# Altium PCB Grantv3.PcbDoc (part 1 of 5)
Units mil, origin at the board's own origin, x right, y up, seen from the top; angles counter-clockwise.
Board outline 3031.03 x 2829.03 mil, 2 copper layers (Top Layer, Bottom Layer); 187 components, 111 nets, 634 pads, 178 vias.
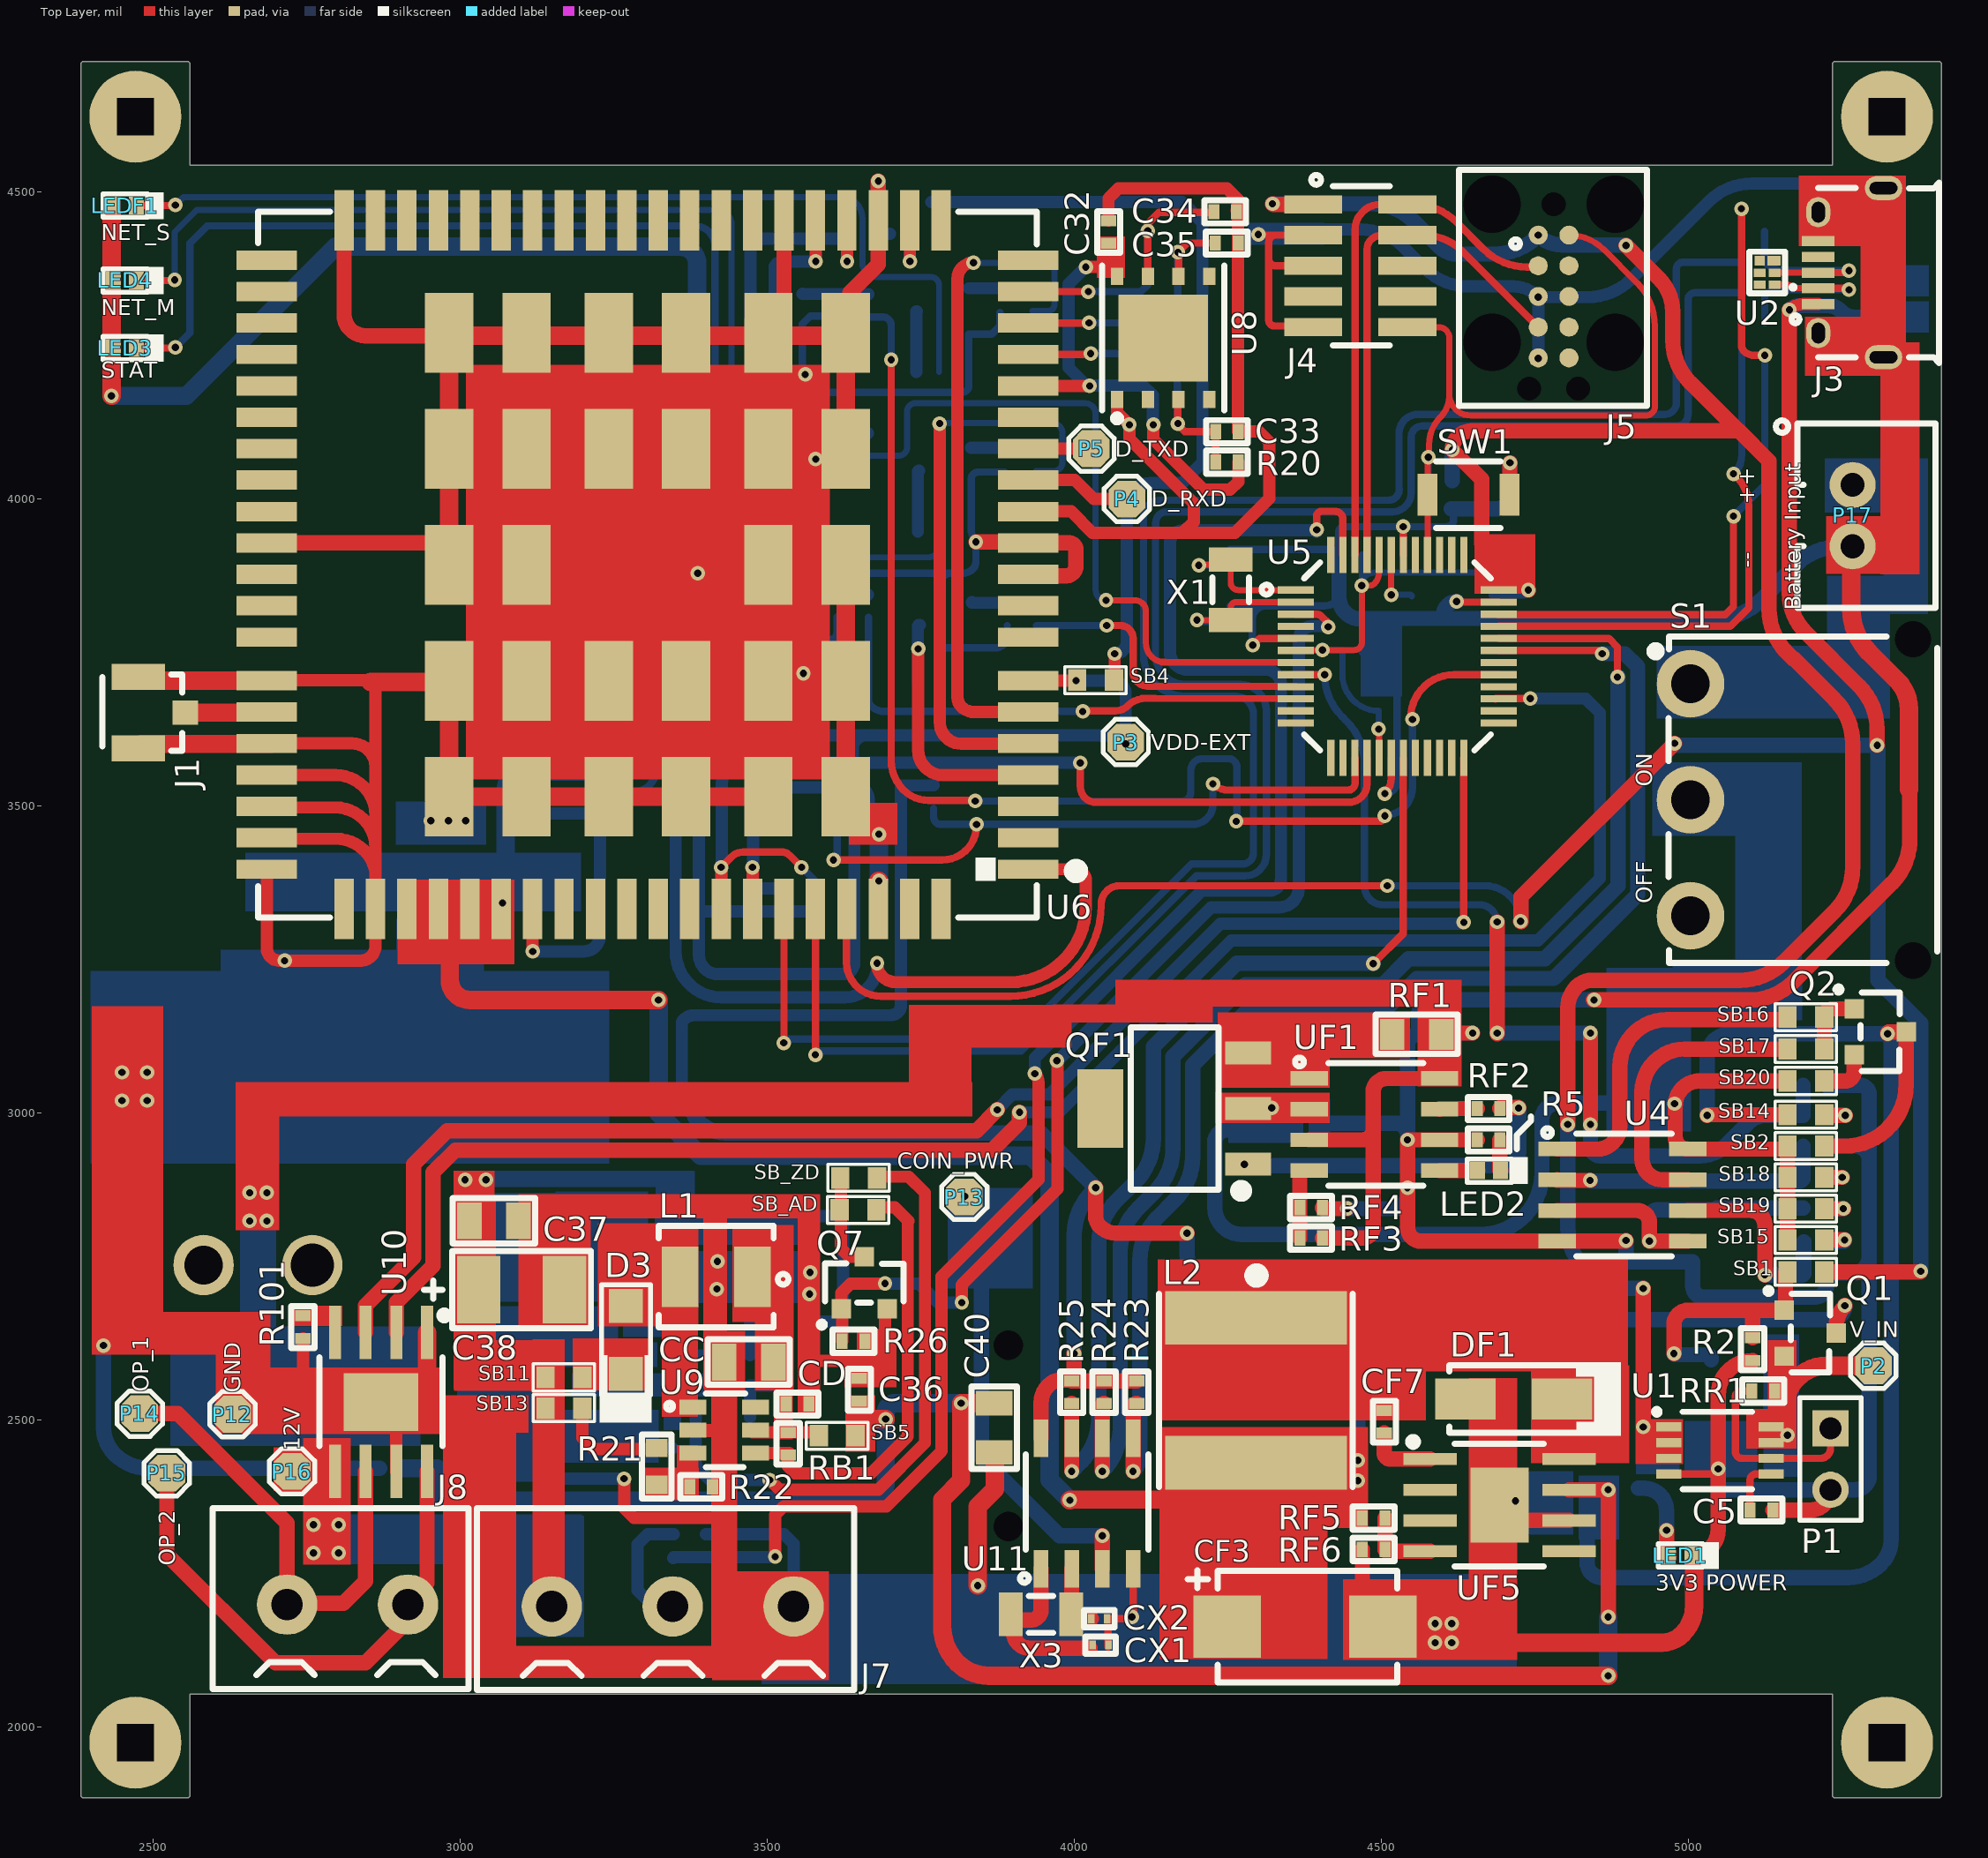
[diagram p0: Top Layer view]
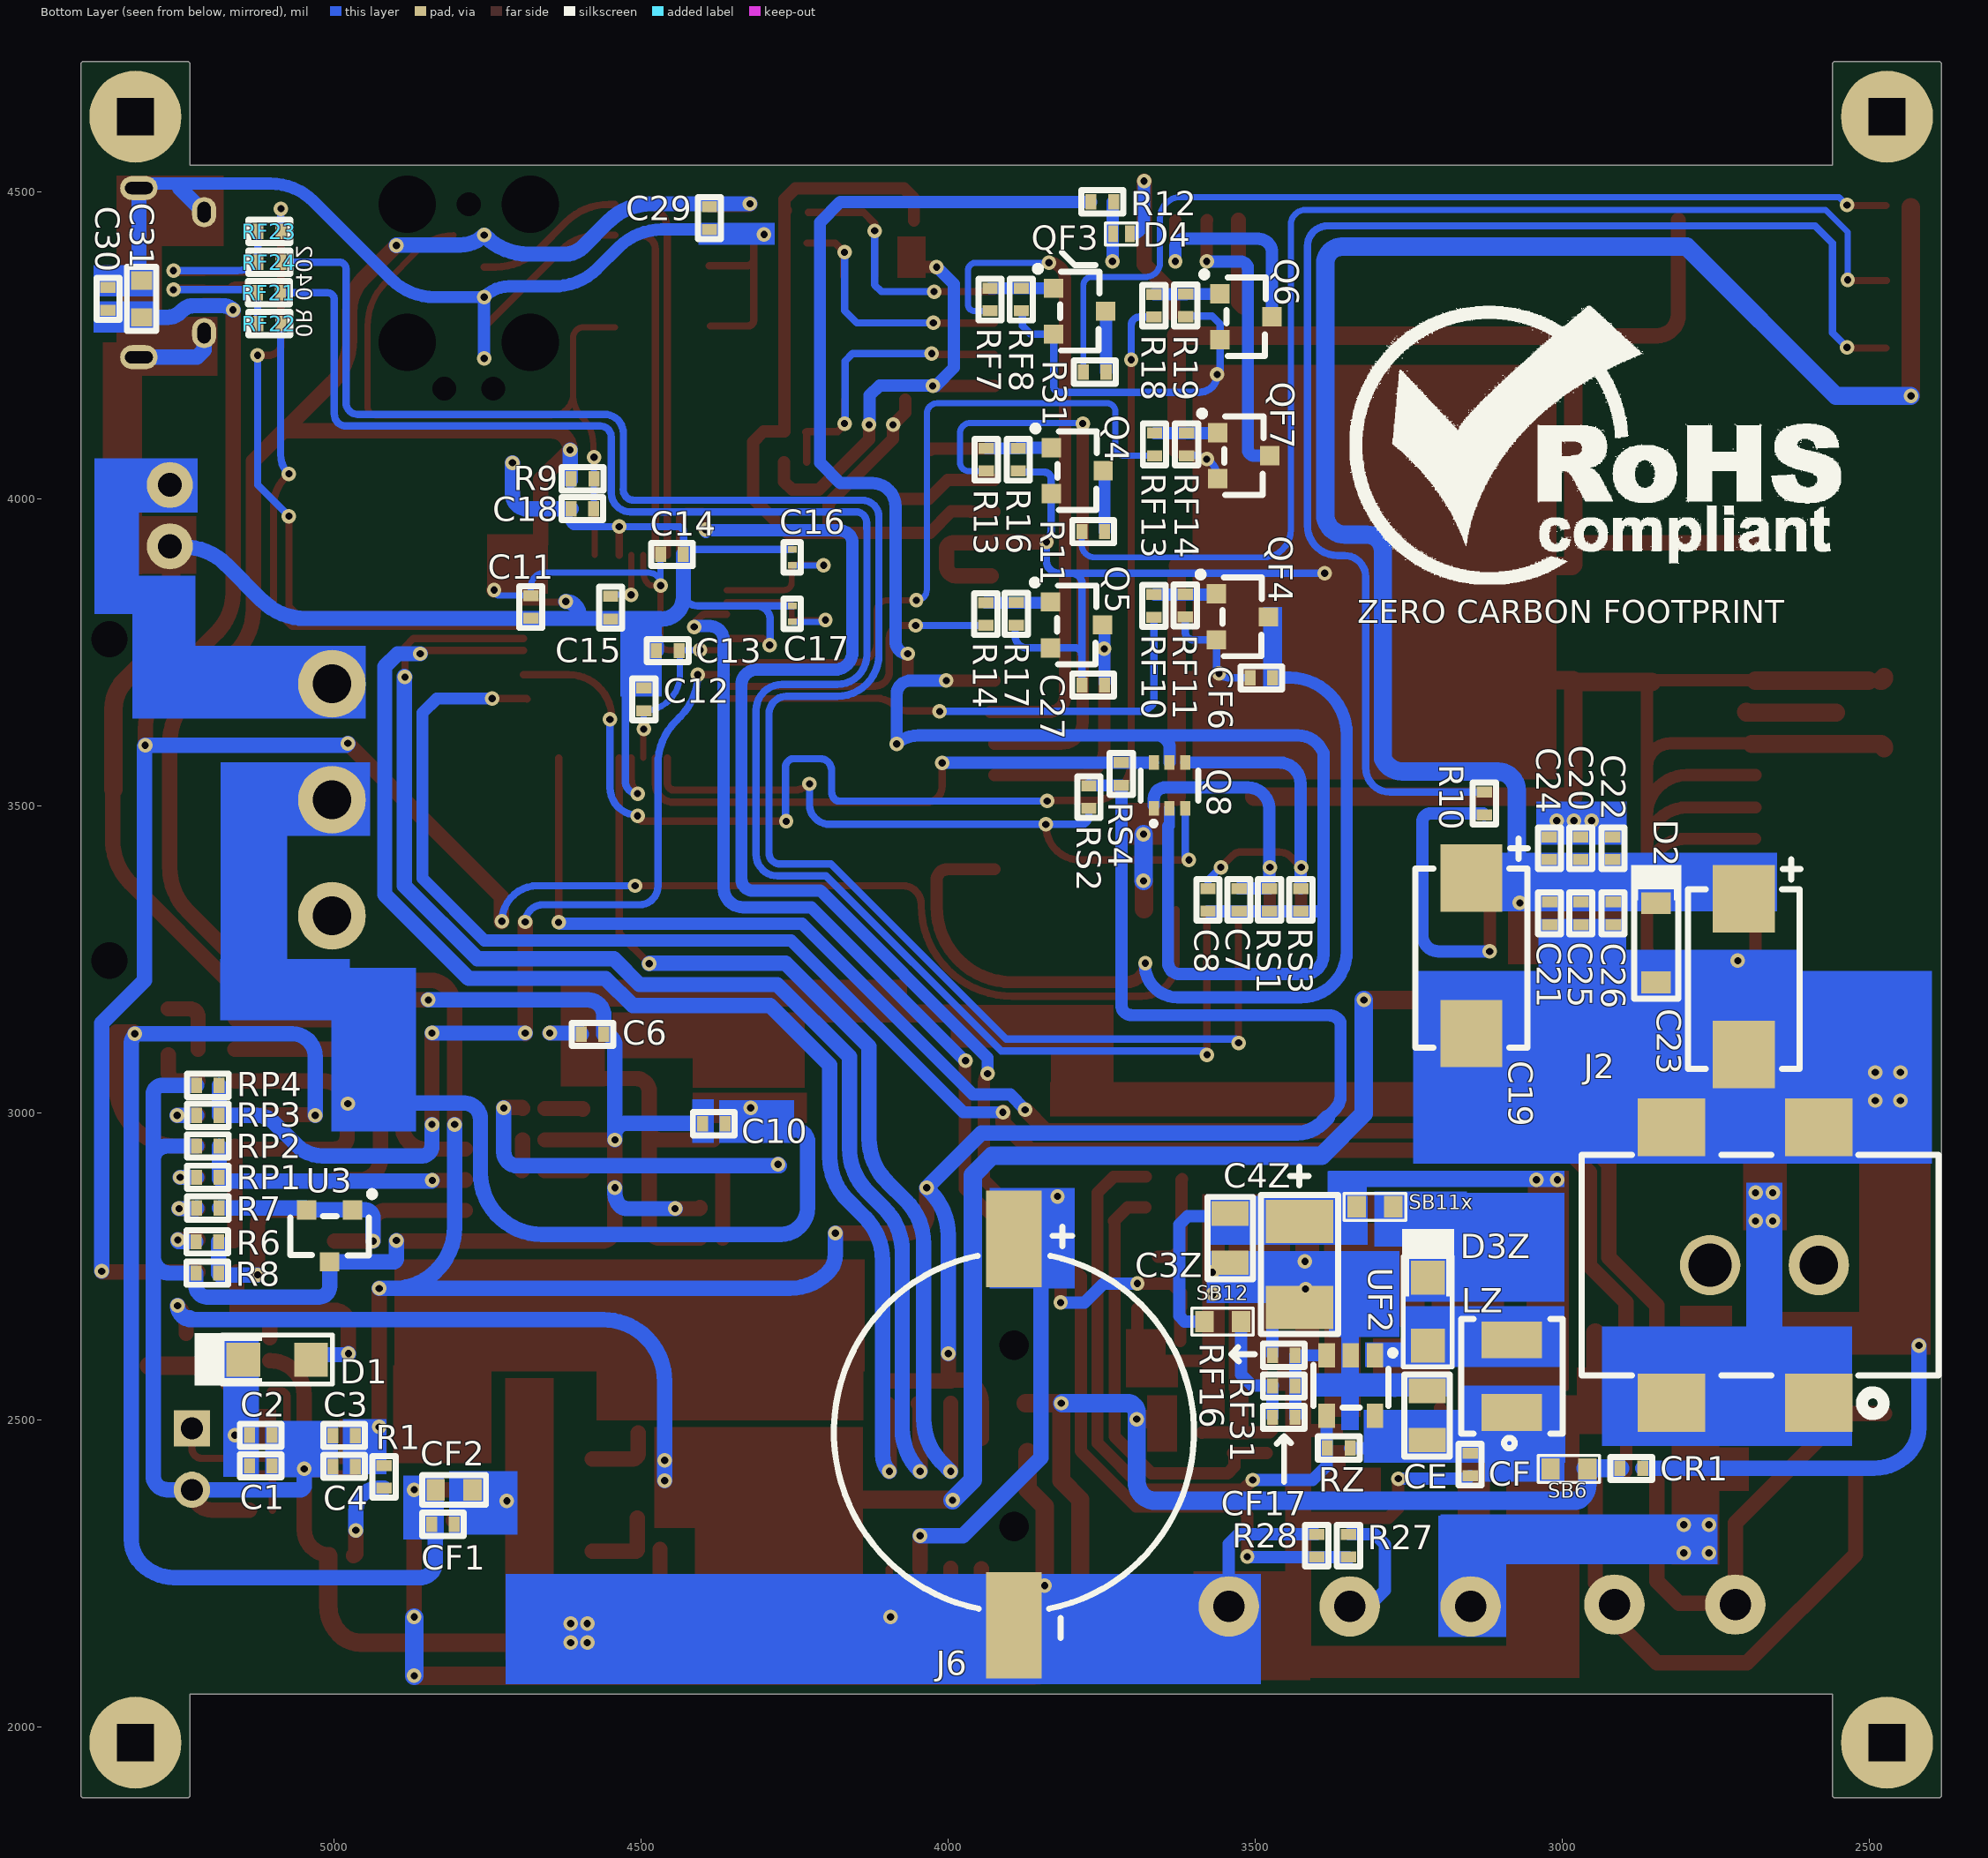
[diagram p1: Bottom Layer view, seen from below]
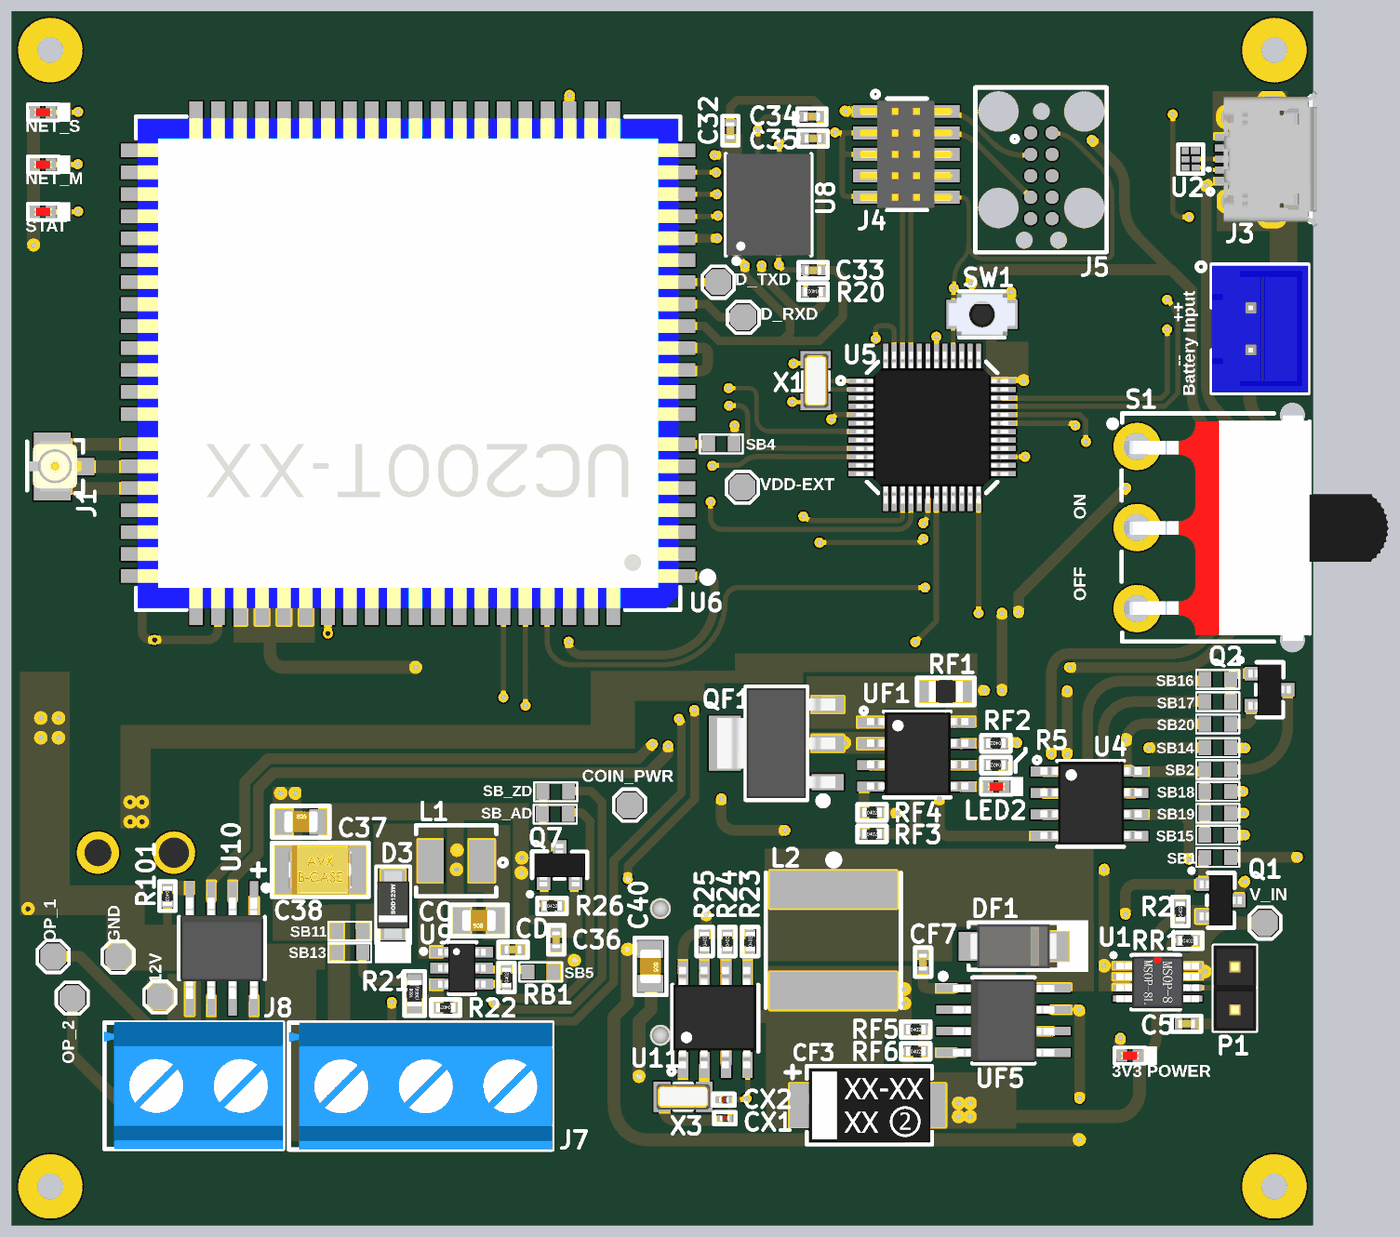
[diagram p4: 3D render of the assembled board from above, using the file's embedded part models]
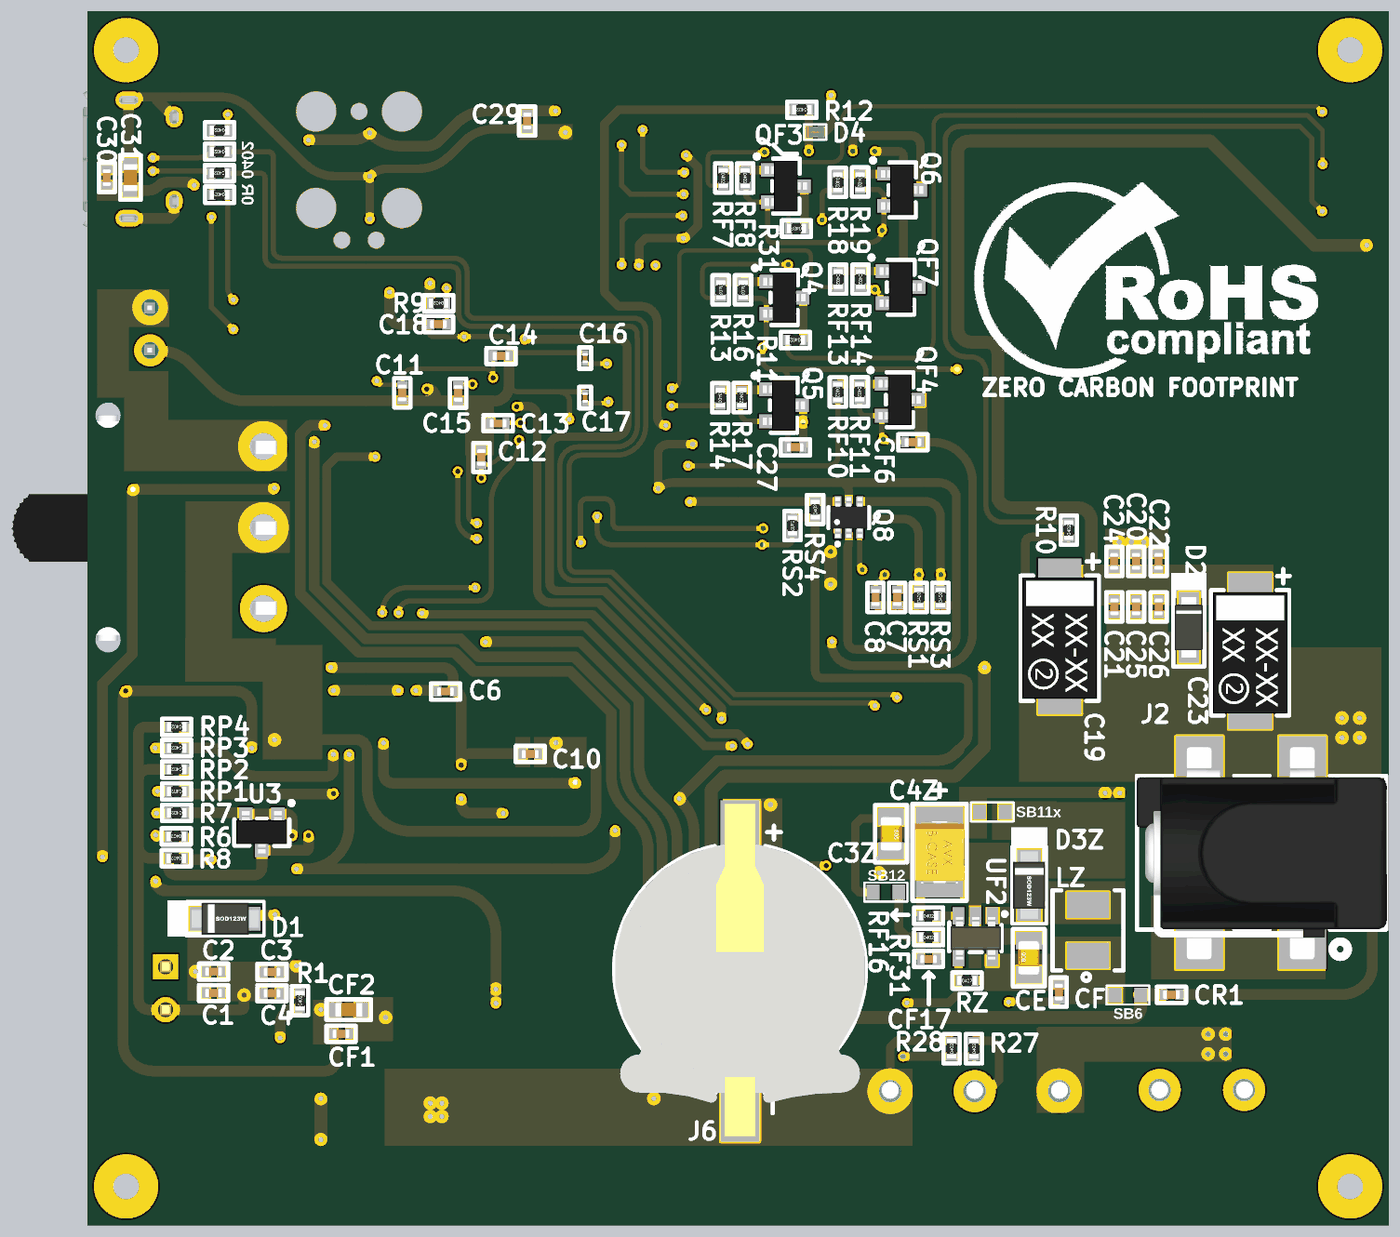
[diagram p5: 3D render of the assembled board from below, using the file's embedded part models]

## Layer stack, top to bottom
Top Solder: solder mask 0.4, Solder Resist, Dk 3.5
Top Layer: signal copper 1.4
Dielectric 1: dielectric 12.6, FR-4, Dk 4.8
Bottom Layer: signal copper 1.4
Bottom Solder: solder mask 0.4, Solder Resist, Dk 3.5

## Board outline
2381.99,1889 ccw(c2387,1889) 2387,1883.98 2555,1883.98 ccw(c2555,1889) 2560.01,1889 2560.01,2052.98 5234.98,2052.99 5234.98,1889 ccw(c5240,1889) 5240,1883.98 5408,1883.98 ccw(c5408,1889) 5413.02,1889 5413.02,2063 5413.02,2058 5413.01,4533.96 ccw(c5408,4534) 5413.02,4534 5413.02,4708 ccw(c5408,4708) 5408,4713.02 5240,4713.02 ccw(c5240,4708) 5234.98,4708 5234.98,4544.02 2560.01,4544.01 2560.01,4708 ccw(c2555,4708) 2555,4713.02 2387,4713.02 ccw(c2387,4708) 2381.99,4708 2381.99,4534 cw(c2387,4534) 2381.99,4534 2381.99,2063.03 ccw(c2387,2063) 2381.99,2063

## Design rules (kind name [scope] priority, off if disabled: settings)
Clearance [All] p1: gap=7 ignorepadtopadclearanceinfootprint=FALSE except(4: Arc-SMDPad Track-SMDPad SMDPad-SMDPad)
ComponentClearance [All] p1: gap=0 collisioncheckmode=3 verticalgap=5 showdistances=FALSE
MinimumSolderMaskSliver [All] p1: minsoldermaskwidth=0
PolygonConnect [All] p1: connectstyle=Relief reliefconductorwidth=10 reliefentries=4 polygonreliefangle="90 Angle" airgapwidth=10
RoutingVias [All] p1: holewidth=11.81 width=23.62 viastyle="Through Hole" minholewidth=11.81 minwidth=23.62 maxholewidth=28 maxwidth=50
SilkToSilkClearance [All] p1: silktosilkclearance=0
SilkToSolderMaskClearance [IsPad] p1: minsilkscreentomaskgap=0 clearancetoexposedcopper=TRUE
SolderMaskExpansion [All] p1: expansion=4
Width [All] p1: maxlimit=30 minlimit=7 preferedwidth=10
26 further rules are at their usual default settings.

## Classes and differential pairs
component class U_Power_Section: C1 C2 C3 C4 C5 CF1 CF2 CF3 CF7 D1 DF1 L2 LED1 P1 P2 Q1 R1 R2 RF5 RF6 RR1 SB1 U1 UF5
component class U_Peripheral_Section: C3Z C4Z C36 C37 C38 C40 CC CD CE CF CF17 CR1 CX1 CX2 D3 D3Z L1 LZ Q7 R21 R22 R23 R24 R25 R26 R27 R28 R101 RB1 RF16 RF31 RZ SB5 SB6 SB11 SB11x SB12 SB13 SB_AD SB_ZD U9 U10 U11 UF2 X3
component class U_Controller_Section: C7 C8 C11 C12 C13 C14 C15 C16 C17 C18 Q8 R9 RS1 RS2 RS3 RS4 SW1 U5 X1
component class U_Connector_Section: C29 C30 C31 C32 C33 C34 C35 J2 J3 J4 J5 J6 J7 J8 P4 P5 P12 P13 P14 P15 P16 P17 R20 RF21 RF22 RF23 RF24 S1 U2 U8
component class U_Battery_Management_Section: C6 C10 LED2 Q2 QF1 R5 R6 R7 R8 RF1 RF2 RF3 RF4 RP1 RP2 RP3 RP4 SB2 SB14 SB15 SB16 SB17 SB18 SB19 SB20 U3 U4 UF1
component class "U_3G Modem_Section": C19 C20 C21 C22 C23 C24 C25 C26 C27 CF6 D2 D4 J1 LED3 LED4 LEDF1 P3 Q4 Q5 Q6 QF3 QF4 QF7 R10 R11 R12 R13 R14 R16 R17 R18 R19 R31 RF7 RF8 RF10 RF11 RF13 RF14 SB4 U6

## Components (designator, comment, footprint, x,y, rotation, side; value= is the part's Value field where it differs from the comment)
C1 "0.1uF" Cap0402 5120,2425 r180 bottom
C2 "1uF" Cap0402 5120,2475 r180 bottom
C3 "0.1uF" Cap0402 4984,2474 r0 bottom
C3Z "22uF" Cap0805 3541,2796 r270 bottom
C4 "1uF" Cap0402 4984,2424 r0 bottom
C4Z "4.7UF" TAJB475K035RNJ 3431,2754 r90 bottom
C5 "10nF" Cap0402 5119.5,2353 r180 top
C6 "0.1uF" Cap0402 4579.5,3128 r180 bottom
C7 "0.1uF" Cap0402 3526.5,3347 r270 bottom
C8 "0.1uF" Cap0402 3577,3347 r270 bottom
C10 "0.1uF" Cap0402 4382,2982 r0 bottom
C11 "0.1uF" Cap0402 4680,3824 r270 bottom
C12 "0.1uF" Cap0402 4496,3673.5 r90 bottom
C13 "0.1uF" Cap0402 4457,3753 r0 bottom
C14 "0.1uF" Cap0402 4450,3910 r180 bottom
C15 "0.1uF" Cap0402 4550,3823 r270 bottom
C16 "20pF" "Cap 0201" 4254,3905.01 r270 bottom
C17 "20pF" "Cap 0201" 4254,3813.01 r270 bottom
C18 "0.1uF" Cap0402 4596,3984 r0 bottom
C19 "100uF" 16TQC100MYF 3148,3256 r270 bottom
C20 "0.1uF" Cap0402 2970,3431 r90 bottom
C21 "10pF" Cap0402 3020.5,3325 r270 bottom
C22 "33pF" Cap0402 2917.5,3431 r90 bottom
C23 "100uF" 16TQC100MYF 2704,3222 r270 bottom
C24 "0.1uF" Cap0402 3021,3431 r90 bottom
C25 "10pF" Cap0402 2969.5,3325 r270 bottom
C26 "33pF" Cap0402 2917,3325 r270 bottom
C27 "10nF" Cap0402 3764,3697 r180 bottom
C29 "0.1uF" Cap0402 4389,4457.5 r270 bottom
C30 "0.1uF" Cap0402 5369,4326 r90 bottom
C31 "4.7UF" Cap0603 5314,4326 r270 bottom
C32 "0.1uF" Cap0402 4056,4435 r90 top
C33 "33pF" Cap0402 4249,4110 r0 top
C34 "33pF" Cap0402 4246,4468 r0 top
C35 "33pF" Cap0402 4248.5,4417 r0 top
C36 "0.1uF" Cap0402 3650,2549 r90 top
C37 "22uF" Cap0805 3055,2824 r0 top
C38 "4.7UF" TAJB475K035RNJ 3099,2709 r180 top
C40 "22uF" Cap0805 3870,2487 r270 top
CC "22uF" Cap0805 3470,2594 r180 top
CD "0.1uF" Cap0402 3549.5,2526 r0 top
CE "22uF" Cap0805 3220,2507 r90 bottom
CF "0.1uF" Cap0402 3150,2427 r270 bottom
CF1 "0.1uF" Cap0402 4823,2330 r180 bottom
CF2 "10uF" Cap0603 4805,2386 r0 bottom
CF3 "220uF" CAP2917 4376,2163 r0 top
CF6 "10nF" Cap0402 3490,3709 r180 bottom
CF7 "10nF" Cap0402 4505,2497 r90 top
CF17 "220pF" Cap0402 3453.5,2504 r0 bottom
CR1 "2.2uF" Cap0402 2887.5,2421 r180 bottom
CX1 "20pF" "Cap 0201" 4043,2133 r180 top
CX2 "20pF" "Cap 0201" 4041.01,2176 r180 top
D1 "PMEG3010ER,115" SOD123W 5093,2598 r0 bottom
D2 "BZD27C5V1P_R1_00001" BZD27C5V1P_R1_00001 2847,3277 r90 bottom value=Custom
D3 "PMEG3010ER,115" SOD123W 3270,2630.12 r270 top
D3Z "PMEG3010ER,115" SOD123W 3219,2676.12 r90 bottom
D4 "ESD9B3.3ST5G-N" ESD9B3.3ST5G-N 3718,4432 r180 bottom value=3.3V
DF1 "B340A-13-F" B340A-13-F 4716,2534 r180 top locked
J1 "U.FL-R-SMT-1(80)" U.FL-R-SMT-1(80) 2516,3652 r90 top
J2 "DC-005-5A-2.5-SMT" DC-005-5A-2.5-SMT 2582,2752 r0 bottom locked value=Custom
J3 "C10418" C10418 5212,4368.82 r90 top locked
J4 "20021121-00010C4LF" 20021121-00010C4LF 4466.23,4380 r270 top
J5 "TC2050-IDC" TC2050-IDC 4781,4480 r270 top locked
J6 "CR1220-2" CR1220-2 3893,2480 r270 bottom locked value=Cuctom
J7 "WJ301V-5.0-3P" WJ301V-5.0-3P 3149.3,2196 r0 top value=Custom
J8 "WJ301V-5.0-2P" WJ301V-5.0-2P 2915,2199 r0 top value=Custom
L1 "MS0420-100M" MS0420-100M 3417,2733 r180 top value=10uH
L2 "SNR8040K-150M" SNR8040K-150M 4296,2548 r270 top value=15uH
LED1 "TJ-S1005SW4TGLC2R-A5" "LED 0402" 4987.3,2279 r0 top value=Custom
LED2 "TJ-S1005SW4TGLC2R-A5" "LED 0402" 4676,2906 r0 top value=Custom
LED3 "TJ-S1005SW4TGLC6B-A5" "LED 0402" 2453.94,4246 r0 top value=Custom
LED4 "TJ-S1005SW4TGLC7K-A5" "LED 0402" 2453.94,4356 r0 top value=Custom
LEDF1 "TJ-S1005SW4TGLC7K-A5" "LED 0402" 2453.94,4478 r0 top value=Custom
LZ "MS0420-100M" MS0420-100M 3082,2571 r90 bottom value=10uH
P1 "61300211121" HDR1X2 5232,2486 r270 top
P2 "TEST POINT" "TEST POINT" 5302,2588 r0 top
P3 "Test Point" "TEST POINT" 4084,3604 r0 top
P4 "Test Point" "TEST POINT" 4086,4000 r0 top
P5 "Test Point" "TEST POINT" 4028,4082 r0 top
P12 "Test Point" "TEST POINT" 2629,2509 r0 top
P13 "Test Point" "TEST POINT" 3821,2863 r0 top
P14 "Test Point" "TEST POINT" 2478,2510 r0 top
P15 "Test Point" "TEST POINT" 2522,2413 r0 top
P16 "Test Point" "TEST POINT" 2726,2416 r0 top
P17 "JST Connector" "2 PIN JST Connector" 5268,4023 r270 top
Q1 "DMP2045U-7" SOT23-3 5199,2641 r270 top
Q2 "PMV65XP,215" SOT23-3 5313,3132 r270 top
Q4 "BSS138LT1G" SOT23-3 3790,4046 r270 bottom
Q5 "BSS138LT1G" SOT23-3 3791,3795 r270 bottom
Q6 "BSS138LT1G" SOT23-3 3515,4297 r270 bottom
Q7 "ZVN3310FTA" SOT23-3 3658,2723 r0 top
Q8 "BSS138PS,115" BSS138PS,115 3639.59,3533.4 r90 bottom
QF1 "NZT660A" NZT660A 4163,3007 r90 top locked
QF3 "BSS138LT1G" SOT23-3 3786,4306 r270 bottom
QF4 "BSS138LT1G" SOT23-3 3521,3808 r270 bottom
QF7 "BSS138LT1G" SOT23-3 3518.68,4070.4 r270 bottom
R1 "470R" Res0402 4919,2407 r90 bottom
R2 "100K" Res0402 5105,2615 r90 top
R5 "2K" Res0402 4675.06,2956 r180 top
R6 "80.6K" Res0402 5207,2790 r0 bottom
R7 "30.9K" Res0402 5206,2845 r0 bottom
R8 "20K" Res0402 5207,2739 r0 bottom
R9 "20K" Res0402 4595.5,4033 r0 bottom
R10 "2.2K" Res0402 3127,3504 r90 bottom
R11 "2.2K" Res0402 3764,3947 r0 bottom
R12 "4.7K" Res0402 3749,4484 r0 bottom
R13 "4.7K" Res0402 3938,4064 r270 bottom
R14 "4.7K" Res0402 3939,3812.5 r270 bottom
R16 "47K" Res0402 3886,4064 r270 bottom
R17 "47K" Res0402 3889,3813 r270 bottom
R18 "4.7K" Res0402 3665,4315 r270 bottom
R19 "47K" Res0402 3613,4315.5 r270 bottom
R20 "15K" Res0402 4249,4060 r180 top
R21 "1.4M" Res0603 3320,2424 r90 top
R22 "71.5K" Res0402 3392.5,2391 r180 top
R23 "10K" Res0402 4102,2545 r90 top
R24 "10K" Res0402 4049,2545 r90 top
R25 "10K" Res0402 3996,2545 r90 top
R26 "10K" Res0402 3640.5,2628 r0 top
R27 "133K" Res0402 3348,2295 r90 bottom
R28 "49.9K" Res0402 3400,2295 r90 bottom
R31 "2.2K" Res0402 3761.5,4207 r0 bottom
R101 "40.2K" Res0402 2744,2651 r270 top
RB1 "47K" Res0402 3534,2461 r90 top
RF1 "0.068R" "RES 0805" 4558,3128 r0 top
RF2 "1K" Res0402 4675.06,3007 r180 top
RF3 "1M" Res0402 4386,2796 r0 top
RF4 "1M" Res0402 4386,2846 r0 top
RF5 "10K" Res0402 4488,2340 r0 top
RF6 "4.7K" Res0402 4488,2289 r0 top
RF7 "4.7K" Res0402 3932,4324.91 r270 bottom
RF8 "47K" Res0402 3881,4324.91 r270 bottom
RF10 "4.7K" Res0402 3665,3826 r270 bottom
RF11 "47K" Res0402 3614,3826.5 r270 bottom
RF13 "4.7K" Res0402 3664,4089 r270 bottom
RF14 "47K" Res0402 3612,4089 r270 bottom
RF16 "13.3K" Res0402 3453.5,2605 r180 bottom
RF21 "0R" Res0402 5106.5,4336 r0 bottom
RF22 "0R" Res0402 5106,4286 r0 bottom
RF23 "0R" Res0402 5106,4436 r0 bottom
RF24 "0R" Res0402 5106,4386 r0 bottom
RF31 "118K" Res0402 3453.5,2555 r180 bottom
RP1 "60.4K" Res0402 5206,2895 r0 bottom
RP2 "20K" Res0402 5206,2946 r0 bottom
RP3 "62K" Res0402 5206,2996 r0 bottom
RP4 "40.2K" Res0402 5206,3045 r0 bottom
RR1 "10K" Res0402 5122.5,2547 r0 top
RS1 "10K" Res0402 3476.5,3347 r90 bottom
RS2 "10K" Res0402 3771,3514.5 r270 bottom
RS3 "10K" Res0402 3426,3347 r90 bottom
RS4 "10K" Res0402 3718,3552 r90 bottom
RZ "47K" Res0402 3364,2454 r180 bottom
S1 "SS-12D11L5" SS-12D11L5 5185,3510 r270 top locked value=Custom
SB1 "Solder Bridge" "Solder Bridge" 5192,2741 r180 top
SB2 "Solder Bridge" "Solder Bridge" 5192,2946 r0 top
SB4 "Solder Bridge" "Solder Bridge" 4035,3705 r0 top
SB5 "Solder Bridge" "Solder Bridge" 3614,2474 r180 top
SB6 "Solder Bridge" "Solder Bridge" 2989,2420 r0 bottom
SB11 "Solder Bridge" "Solder Bridge" 3169,2569 r180 top
SB11x "Solder Bridge" "Solder Bridge" 3305,2847 r0 bottom
SB12 "Solder Bridge" "Solder Bridge" 3553,2660 r0 bottom
SB13 "Solder Bridge" "Solder Bridge" 3169,2519 r180 top
SB14 "Solder Bridge" "Solder Bridge" 5192,2997 r0 top
SB15 "Solder Bridge" "Solder Bridge" 5192,2793 r0 top
SB16 "Solder Bridge" "Solder Bridge" 5192,3156 r0 top
SB17 "Solder Bridge" "Solder Bridge" 5192,3104 r0 top
SB18 "Solder Bridge" "Solder Bridge" 5192,2895 r0 top
SB19 "Solder Bridge" "Solder Bridge" 5192,2844 r0 top
SB20 "Solder Bridge" "Solder Bridge" 5192,3052 r0 top
SB_AD "Solder Bridge" "Solder Bridge" 3648,2842 r180 top
SB_ZD "Solder Bridge" "Solder Bridge" 3649,2894 r180 top
SW1 "B3U-1000P" B3U-1000P 4642.57,4007 r0 top
U1 "NCP3335ADM330R2G" NCP3335ADM330R2G 5052,2450 r0 top locked
U2 "SP3014-02UTG" SP3014-02UTG 5141,4349 r180 top locked
U3 "TLV431BFTA" SOT23-3 5007.6,2799.68 r0 bottom
U4 "LM393DT" LM393DT 4893,2866 r0 top
U5 "SAMD21G18A-AUT" SAMD21G18A-AUT 4526.35,3743.47 r0 top locked
U6 "UC200T" UC200T 3304.99,3893.02 r180 top locked value=Custom
U8 "SIM-ST-MFF2" SIM-ST-MFF2 4145,4262.39 r90 top locked
U9 "AX5523CA" SOT-23-6 3430,2483 r0 top
U10 "DRV8871DDAR" DRV8871DDAR 2871,2529 r270 top locked
U11 "MCP7940N-I/SN" MCP7940N-I/SN 4021,2363.7 r90 top
UF1 "BQ2057WSNTR" BQ2057WSNTR 4489,2981 r0 top locked
UF2 "LMR62014XMF/NOPB" SOT23-5 3305,2605 r0 bottom
UF5 "TPS5430QDDARQ1" TPS5430QDDARQ1 4693,2361 r0 top locked
X1 "NX3215SA-32.768K-STD-MUA-8" "2-SMD, No Lead" 4255,3852 r90 top
X3 "NX3215SA-32.768K-STD-MUA-8" "2-SMD, No Lead" 3946,2183 r180 top

## Footprints (in the part's own frame and the unit in brackets; to place one, negate y for a bottom-side part, rotate by r counter-clockwise, add the part's x,y. Pads: shape width x height; smd on the part's side, far side on the other; paste and mask are expansions set on the pad)
"2 PIN JST Connector" [mil] "2 Pin JST Connector"
  round 75 hole 39: 1(0,0) 2(100,0)
  silkscreen extent -105,-125 200,135, body extent -98,-89 198,135, height 284
"2-SMD, No Lead" [mm] "NX3215SA-32.768K-STD-MUA-8"
  rect 1x1.8 smd: 1(-1.25,0) 2(1.25,0)
  silkscreen extent -0.51,-0.76 0.51,0.76, body extent -1.6,-0.75 1.6,0.75, height 0.8
16TQC100MYF [mm]
  rect 2.79x2.57 smd: 1(-3.22,0) 2(3.22,0)
  silkscreen extent -4.85,-2.31 3.81,2.34, body extent -3.49,-2.21 3.7,2.21, height 2.88
20021121-00010C4LF [mm]
  rect 0.76x2.4 smd: 1(-2.54,-1.95) 2(-2.54,1.95) 3(-1.27,-1.95) 4(-1.27,1.95) 5(0,-1.95) 6(0,1.95) 7(1.27,-1.95) 8(1.27,1.95) 9(2.54,-1.95) 10(2.54,1.95)
  silkscreen extent -3.75,-2.03 3.3,1.22, body extent -3.17,-2.78 3.18,2.72, height 4.5
B3U-1000P [mm] "SWITCH TACTILE SPST-NO 0.05A 12V"
  rect 0.82x1.72 smd: 1(-1.7,0) 2(1.7,0)
  silkscreen extent -1.35,-1.37 1.32,1.37, body extent -2,-1.26 2,1.24, height 1.6
B340A-13-F [mm]
  rect 2.5x1.7 smd: 1(-2,0) 2(2,0)
  silkscreen extent -4.44,-1.52 2.67,1.52, body extent -2.6,-1.3 2.6,1.3, height 2.3
BQ2057WSNTR [mm]
  rect 1.55x0.6 smd: 1(-2.7,1.905) 2(-2.7,0.635) 3(-2.7,-0.635) 4(-2.7,-1.905) 5(2.7,-1.905) 6(2.7,-0.635) 7(2.7,0.635) 8(2.7,1.905)
  silkscreen extent -3.28,-2.54 2.03,2.77, body extent -2.91,-2.41 3.09,2.49, height 1.65
BSS138PS,115 [mm]
  rect 0.6x0.42 smd: 1(-0.95,0.65) 2(-0.95,0) 3(-0.95,-0.65) 4(0.95,-0.65) 5(0.95,0) 6(0.95,0.65)
  silkscreen extent -1.65,-1.19 0.61,1.19, body extent -1.2,-1.1 1.2,1.1, height 1.09
BZD27C5V1P_R1_00001 [mm]
  rect 0.91x1.22 smd: 1(-1.64,0) 2(1.64,0)
  silkscreen extent -2.31,-1.04 3.23,1.04, body extent -1.79,-0.83 1.79,0.82, height 0.95
C10418 [mm] "USB - Micro B Female USB 2 5 SMD USB Connectors RoHS"
  rect 0.42x1.35 smd: 1(-1.3,0) 2(-0.65,0) 3(0,0) 4(0.65,0) 5(1.3,0)
  oval 1.25x1 hole 0.55 slot 0.85 at 0 deg: MH1(-2.5,0) MH2(2.5,0)
  oval 1x1.55 hole 0.5 slot 1.15 at 90 deg: MH3(-3.5,-2.7) MH4(3.5,-2.7)
  silkscreen extent -3.73,-5 3.72,1.1, body extent -7.67,-5.38 4.02,0.2, height 2.72
Cap0402 [mil]
  rect 18x25 smd: 1(-18.5,0) 2(18.5,0)
  silkscreen extent -34,-19 34,19, body extent -20,-10 20,10, height 19
Cap0603 [mil]
  rect 30x35 smd: 1(30,0) 2(-30,0)
  silkscreen extent -52,-24 52,24, body extent -31,-16 32,16, height 34
Cap0805 [mil] "SMD 0805"
  rect 40x60 smd: 1(-40,0) 2(40,0)
  silkscreen extent -67,-37 67,37, body extent -39,-25 39,25, height 30
CAP2917 [mm]
  rect 2.79x2.57 smd: 1(-3.22,0) 2(3.22,0)
  silkscreen extent -4.85,-2.31 3.81,2.34, body extent -3.49,-2.21 3.7,2.21, height 2.88
"Cap 0201" [mm]
  rect 0.27x0.37 smd: 1(-0.33,0) 2(0.33,0)
  silkscreen extent -0.64,-0.36 0.64,0.36, body extent -0.3,-0.16 0.3,0.17, height 0.21
CR1220-2 [mm]
  rect 4x2.3 smd: 1(-8,0)
  rect 4.4x2.3 smd: 2(8,0)
  round 0 hole 1.22: MH1(-3.6,0) MH2(3.9,0)
  silkscreen extent -8.5,-7.45 8.52,7.45, body extent -9.8,-7.45 9.9,7.45, height 4
DC-005-5A-2.5-SMT [mm]
  rect 2.8x2.4 smd: 1(0,5.7) 1(6.1,5.7) 2(0,-5.7) 3(6.1,-5.7)
  round 2.5 hole 1.6 unplated: MH1(0,0)
  round 2.5 hole 1.8 unplated: MH2(4.5,0)
  silkscreen extent -4.95,-4.56 9.8,6.16, body extent -4.99,-6.27 9.81,6.33, height 11.17
DRV8871DDAR [mm]
  rect 2.2x0.5 smd: 1(-2.875,1.905) 2(-2.875,0.635) 3(-2.875,-0.635) 4(-2.875,-1.905) 5(2.875,-1.905) 6(2.875,-0.635) 7(2.875,0.635) 8(2.875,1.905)
  rect 2.4x3.1 smd: 9(0,0)
  silkscreen extent -3.66,-2.54 1.83,2.69, body extent -3,-2.46 3,2.44, height 1.68
ESD9B3.3ST5G-N [mm] "TVS DIODE Bidirectional 3.3V (Max) 3.8V 8V 10A SOD923"
  rect 0.4x0.7 smd: 1(-0.35,0) 2(0.35,0)
  silkscreen extent -0.66,-0.46 0.66,0.46, body extent -0.52,-0.32 0.53,0.33, height 0.43
HDR1X2 [mm] "CONN HEADER VERT 2POS 2.54MM"
  rect 1.5x1.5 hole 0.9: 1(0,0)
  round 1.5 hole 0.9: 2(2.54,0)
  silkscreen extent -1.27,-1.27 3.81,1.27, body extent -1.27,-1.27 3.81,1.27, height 8.44
"LED 0402" [mm]
  rect 0.62x0.72 smd: 1(-0.475,0) 2(0.475,0)
  silkscreen extent -0.91,-0.56 1.6,0.56, body extent -0.5,-0.25 0.51,0.25, height 0.45
LM393DT [mm]
  rect 1.55x0.6 smd: 1(-2.7,1.905) 2(-2.7,0.635) 3(-2.7,-0.635) 4(-2.7,-1.905) 5(2.7,-1.905) 6(2.7,-0.635) 7(2.7,0.635) 8(2.7,1.905)
  silkscreen extent -3.28,-2.54 2.03,2.77, body extent -2.91,-2.41 3.09,2.49, height 1.65
MCP7940N-I/SN [mm]
  rect 1.55x0.6 smd: 1(-2.7,1.905) 2(-2.7,0.635) 3(-2.7,-0.635) 4(-2.7,-1.905) 5(2.7,-1.905) 6(2.7,-0.635) 7(2.7,0.635) 8(2.7,1.905)
  silkscreen extent -3.28,-2.54 2.03,2.77, body extent -2.91,-2.41 3.09,2.49, height 1.65
MS0420-100M [mm]
  rect 1.52x2.5 smd: 1(-1.5,0) 2(1.5,0)
  silkscreen extent -2.99,-2.1 2.37,2.1
NCP3335ADM330R2G [mm]
  rect 1.04x0.38 smd: 1(-2.12,0.975) 2(-2.12,0.325) 3(-2.12,-0.325) 4(-2.12,-0.975) 5(2.12,-0.975) 6(2.12,-0.325) 7(2.12,0.325) 8(2.12,0.975)
  silkscreen extent -2.73,-1.6 1.32,1.71, body extent -2.46,-1.53 2.46,1.52, height 1.01
NZT660A [mm]
  rect 0.95x1.9 smd: 1(-2.3,-3.05) 2(0,-3.05) 3(2.3,-3.05)
  rect 3.25x1.9 smd: 4(0,3.05)
  silkscreen extent -3.61,-2.97 3.35,1.8, body extent -3.25,-3.5 3.25,3.5, height 1.61
Res0402 [mil]
  rect 18x25 smd: 1(-18.5,0) 2(18.5,0)
  silkscreen extent -34,-19 34,19, body extent -23,-11 23,11, height 16
Res0603 [mil]
  rect 30x35 smd: 1(30,0) 2(-30,0)
  silkscreen extent -52,-24 52,24, body extent -31,-17 31,17, height 18
"RES 0805" [mil] "SMD 0805"
  rect 40x50 smd: 1(-40,0) 2(40,0)
  silkscreen extent -67,-32 67,32, body extent -39,-25 39,24, height 24
SAMD21G18A-AUT [mm] "IC MCU 32BIT 256KB FLASH 48TQFP"
  rect 1.5x0.3 smd: 1(-4.2,2.75) 2(-4.2,2.25) 3(-4.2,1.75) 4(-4.2,1.25) 5(-4.2,0.75) 6(-4.2,0.25) 7(-4.2,-0.25) 8(-4.2,-0.75) 9(-4.2,-1.25) 10(-4.2,-1.75) 11(-4.2,-2.25) 12(-4.2,-2.75) 25(4.2,-2.75) 26(4.2,-2.25) 27(4.2,-1.75) 28(4.2,-1.25) 29(4.2,-0.75) 30(4.2,-0.25) 31(4.2,0.25) 32(4.2,0.75) 33(4.2,1.25) 34(4.2,1.75) 35(4.2,2.25) 36(4.2,2.75)
  rect 0.3x1.5 smd: 13(-2.75,-4.2) 14(-2.25,-4.2) 15(-1.75,-4.2) 16(-1.25,-4.2) 17(-0.75,-4.2) 18(-0.25,-4.2) 19(0.25,-4.2) 20(0.75,-4.2) 21(1.25,-4.2) 22(1.75,-4.2) 23(2.25,-4.2) 24(2.75,-4.2) 37(2.75,4.2) 38(2.25,4.2) 39(1.75,4.2) 40(1.25,4.2) 41(0.75,4.2) 42(0.25,4.2) 43(-0.25,4.2) 44(-0.75,4.2) 45(-1.25,4.2) 46(-1.75,4.2) 47(-2.25,4.2) 48(-2.75,4.2)
  silkscreen extent -5.61,-3.89 3.86,3.89, body extent -4.5,-4.5 4.5,4.5, height 1.42
SIM-ST-MFF2 [mm]
  rect 0.71x0.51 smd: 1(-2.55,1.905) 2(-2.55,0.635) 3(-2.55,-0.635) 4(-2.55,-1.905) 5(2.55,-1.905) 6(2.55,-0.635) 7(2.55,0.635) 8(2.55,1.905)
  rect 3.6x3.7 smd: 9(0,0)
  silkscreen extent -3.47,-2.53 3,2.53, body extent -3,-2.5 3,2.5, height 0.82
SNR8040K-150M [mm]
  rect 2.22x7.52 smd: 1(-3,0) 2(3,0)
  silkscreen extent -5,-4 4,4
SOD123W [mm] "DIODE SCHOTTKY 30V 1A SOD123W"
  rect 1.4x1.4 smd: A(-1.4,0) K(1.4,0)
  silkscreen extent -2.29,-1.09 3.43,1.07, body extent -2,-0.95 2,0.95, height 1.1
"Solder Bridge" [mil] "Solder Bridge ON"
  rect 30x35 smd: 1(-30,0) 2(30,0)
  silkscreen extent -50,-22 50,22
SOT23-3 [mm] "SOT23, 3-Leads, Body 2.9x1.3mm, Pitch 0.95mm, Lead Span 2.3mm - Reverse Pinning, IPC High Density"
  rect 0.8x0.8 smd: 1(-0.95,-1.075) 2(0.95,-1.075) 3(0,1.075)
  silkscreen extent -1.88,-1.85 1.63,0.81, body extent -1.5,-1.25 1.5,1.25, height 1.05
SOT23-5 [mil] "SOT23-5 Package"
  rect 27x40 smd: 1(0,0) 2(39.37,0) 3(78.74,0) 4(78.74,98.43) 5(0,98.43)
  silkscreen extent -33,-8 100,85, body extent -21,3 98,102, height 43
SOT-23-6 [mm] "IC BAT CHG LI-ION 1 CELL SOT23-6"
  rect 1.12x0.62 smd: 1(-1.3,0.95) 2(-1.3,0) 3(-1.3,-0.95) 4(1.3,-0.95) 5(1.3,0) 6(1.3,0.95)
  silkscreen extent -2.4,-1.52 0.86,1.52, body extent -1.4,-1.45 1.4,1.45, height 1.44
SP3014-02UTG [mm]
  rect 0.48x0.35 smd: 1(0,0) 2(0,-0.5) 5(0.62,-0.5) 6(0.62,0)
  rect 0.55x0.4 smd: 3(0.025,-1)
  rect 0.42x0.4 smd: 4(0.62,-1)
  silkscreen extent -0.82,-1.37 1.04,0.36
SS-12D11L5 [mm]
  round 2.8 hole 1.6: 1(-4.8,-4.6) 2(0,-4.6) 3(4.8,-4.6)
  round 0 hole 1.5 unplated: MH1(-6.65,4.6) MH2(6.65,4.6)
  silkscreen extent -6.76,-6.17 6.76,5.61, body extent -6.65,-5.39 6.7,10.3, height 6.85
TAJB475K035RNJ [mil]
  rect 70.87x110 smd: 1(-71,-3) 2(69,-3)
  silkscreen extent -114,-66 158,60, body extent -74,-61 72,55, height 77
TC2050-IDC [mil] "CBL PLUG-OF-NAILS 10-PIN W/LEGS"
  round 30.98 smd: 1(50,-25) 2(100,-25) 3(150,-25) 4(200,-25) 5(250,-25) 6(250,25) 7(200,25) 8(150,25) 9(100,25) 10(50,25)
  round 0 hole 93.5: MP1(0,-100) MP2(225,-100) MP3(225,100) MP4(0,100)
  round 0 hole 39.02: MP5(0,0) MP6(300,-39.96) MP7(300,39.96)
  silkscreen extent -56,-154 328,152
"TEST POINT" [mil]
  oct 60x60 smd: 1(0,0)
  silkscreen extent -37,-37 37,37
TPS5430QDDARQ1 [mm]
  rect 2.2x0.5 smd: 1(-2.875,1.905) 2(-2.875,0.635) 3(-2.875,-0.635) 4(-2.875,-1.905) 5(2.875,-1.905) 6(2.875,-0.635) 7(2.875,0.635) 8(2.875,1.905)
  rect 2.4x3.1 smd: 9(0,0)
  silkscreen extent -3.66,-2.54 1.83,2.69, body extent -3,-2.46 3,2.44, height 1.68
U.FL-R-SMT-1(80) [mm]
  rect 1.02x1.07 smd: 1(0,-0.923)
  rect 1.07x2.2 smd: 2(1.475,1.025) 3(-1.475,1.025)
  silkscreen extent -1.57,-0.79 1.57,2.51, body extent -1.47,-0.69 1.53,2.41, height 1.2
UC200T [mm]
  rect 2.5x0.8 smd: 1(-15.75,12.6) 2(-15.75,11.3) 3(-15.75,10) 4(-15.75,8.7) 5(-15.75,7.4) 6(-15.75,6.1) 7(-15.75,4.8) 8(-15.75,0.4) 9(-15.75,-0.9) 10(-15.75,-2.2) 11(-15.75,-3.5) 12(-15.75,-4.8) 13(-15.75,-6.1) 14(-15.75,-7.4) 15(-15.75,-8.7) 16(-15.75,-10) 17(-15.75,-11.3) 18(-15.75,-12.6) 37(15.75,-12.6) 38(15.75,-11.3) 39(15.75,-10) 40(15.75,-8.7) 41(15.75,-7.4) 42(15.75,-6.1) 43(15.75,-4.8) 44(15.75,-3.5) 45(15.75,-2.2) 46(15.75,-0.9) 47(15.75,0.4) 48(15.75,4.8) 49(15.75,6.1) 50(15.75,7.4) 51(15.75,8.7) 52(15.75,10) 53(15.75,11.3) 54(15.75,12.6) 141(-15.75,3) 142(-15.75,1.7) 143(15.75,1.7) 144(15.75,3)
  rect 0.8x2.5 smd: 19(-9.55,-14.25) 20(-8.25,-14.25) 21(-6.95,-14.25) 22(-5.65,-14.25) 23(-4.35,-14.25) 24(-3.05,-14.25) 25(-1.75,-14.25) 26(-0.45,-14.25) 27(0.85,-14.25) 28(2.15,-14.25) 29(3.45,-14.25) 30(4.75,-14.25) 31(6.05,-14.25) 32(7.35,-14.25) 33(8.65,-14.25) 34(9.95,-14.25) 35(11.25,-14.25) 36(12.55,-14.25) 55(12.55,14.25) 56(11.25,14.25) 57(9.95,14.25) 58(8.65,14.25) 59(7.35,14.25) 60(6.05,14.25) 61(4.75,14.25) 62(3.45,14.25) 63(2.15,14.25) 64(0.85,14.25) 65(-0.45,14.25) 66(-1.75,14.25) 67(-3.05,14.25) 68(-4.35,14.25) 69(-5.65,14.25) 70(-6.95,14.25) 71(-8.25,14.25) 72(-9.55,14.25) 113(-10.85,14.25) 114(-12.15,14.25) 115(-10.85,-14.25) 116(-12.15,-14.25)
  rect 2x3.3 smd: 85(8.2,9.6) 86(8.2,4.8) 87(8.2,0) 88(8.2,-4.8) 89(8.2,-9.6) 90(5,9.6) 91(5,4.8) 92(5,0) 93(5,-4.8) 94(5,-9.6) 95(1.6,9.6) 96(1.6,4.8) 97(1.6,-4.8) 98(1.6,-9.6) 99(-1.6,9.6) 100(-1.6,4.8) 101(-1.6,-4.8) 102(-1.6,-9.6) 103(-5,9.6) 104(-5,4.8) 105(-5,0) 106(-5,-4.8) 107(-5,-9.6) 108(-8.2,9.6) 109(-8.2,4.8) 110(-8.2,0) 111(-8.2,-4.8) 112(-8.2,-9.6)
  silkscreen extent -17.98,-14.61 16.1,14.61, body extent -16,-14.5 16,14.5, height 2.4
WJ301V-5.0-2P [mm]
  round 2.5 hole 1.3: 1(-5,0) 2(0,0)
  silkscreen extent -8.07,-3.5 2.5,3.99, body extent -8.1,-3.5 2.5,4, height 10
WJ301V-5.0-3P [mm]
  round 2.5 hole 1.3: 1(0,0) 2(5,0) 3(10,0)
  silkscreen extent -3.1,-3.45 12.5,4.06, body extent -3.1,-3.44 12.5,4.05, height 10

## Part data
C1 C3 C6 C7 C8 C10 C11 C12 C13 C14 C15 C18 C20 C24 C29 C30 C32 C36 CD CF CF1: library part CC0402KRX7R7BB104, "CAP CER 0.1UF 16V X7R 0402", Capacitance=100nF, Case/Package=0402, Case Code (Metric)=1005, Dielectric=X7R, MANUFACTURER=Yageo, Max Operating Temperature=125°C, Min Operating Temperature=-55°C, Package Quantity=1, Supplier Part Number 1=311-1338-1-ND, Tolerance=10%, Voltage=16V, Case Code (Imperial)=0402, ComponentLink1Description=http://www.yageo.com/documents/recent/UPY-GPHC_X7R_6.3V-to-50V_8.pdf?src-supplier=Avnet+Europe, ComponentLink1URL=http://www.yageo.com/documents/recent/UPY-GPHC_X7R_6.3V-to-50V_8.pdf?src-supplier=Avnet+Europe, ComponentLink2Description=http://www.yageo.com/documents/recent/UPY-GPHC_X7R_6.3V-to-50V_18.pdf?src-supplier=Digi-Key, ComponentLink2URL=http://www.yageo.com/documents/recent/UPY-GPHC_X7R_6.3V-to-50V_18.pdf?src-supplier=Digi-Key, ComponentLink3Description=http://www.yageo.com/documents/recent/UPY-GPHC_X7R_6.3V-to-50V_8.pdf?src-supplier=Avnet, ComponentLink3URL=http://www.yageo.com/documents/recent/UPY-GPHC_X7R_6.3V-to-50V_8.pdf?src-supplier=Avnet, ComponentLink4Description=http://www.yageo.com/documents/recent/UPY-GPHC_X7R_6.3V-to-50V_18.pdf?src-supplier=Mouser, ComponentLink4URL=http://www.yageo.com/documents/recent/UPY-GPHC_X7R_6.3V-to-50V_18.pdf?src-supplier=Mouser, ComponentLink5Description=http://www.farnell.com/datasheets/2167236.pdf?src-supplier=Element14, ComponentLink5URL=http://www.farnell.com/datasheets/2167236.pdf?src-supplier=Element14, ComponentLink6Description=http://www.farnell.com/datasheets/1489800.pdf?src-supplier=Element14, ComponentLink6URL=http://www.farnell.com/datasheets/1489800.pdf?src-supplier=Element14, Composition=Ceramic, Depth=0.5mm, Halogen Free="Halogen Free", Height=0.5mm, Lead Free="Lead Free", Length=1mm, Manufacturer Part Number=CC0402KRX7R7BB104, Mount="Surface Mount", Number of Pins=2, Packaging="Tape and Reel", Pricing 1="1=0.1, 10=0.034, 100=0.015, 500=0.0107, 1000=0.00841, 2500=0.00764, 5000=0.00703 (USD)", Radiation Hardening=No, REACH SVHC="No SVHC", Stock 1=16982736, Supplier 1=Digi-Key, Termination=SMD/SMT, Thickness=0.022inch, Voltage Rating=16V, Voltage Rating (DC)=16V, Width=0.02inch
C2 C4: library part GRM155R61E105KA12D, "CAP CER 1UF 25V X5R 0402", Case/Package=0402, Case Code (Metric)=1005, Dielectric=X5R, MANUFACTURER=Murata, Max Operating Temperature=85°C, Min Operating Temperature=-55°C, Package Quantity=10000, Supplier Part Number 1=490-10017-1-ND, Tolerance=10%, Voltage=25V, Capacitance=1uF, Case Code (Imperial)=0402, ComponentLink1Description=http://www.farnell.com/datasheets/2048341.pdf?src-supplier=Element14, ComponentLink1URL=http://www.farnell.com/datasheets/2048341.pdf?src-supplier=Element14, Depth=0.5mm, Height=0.5mm, Lead Free="Lead Free", Length=1mm, Manufacturer Part Number=GRM155R61E105KA12D, Material=Ceramic, Mount="Surface Mount", Packaging="Tape and Reel", Pricing 1="1=0.11, 10=0.077, 100=0.0363, 500=0.02546, 1000=0.02108, 2500=0.01962, 5000=0.01795 (USD)", REACH SVHC="No SVHC", Stock 1=1194305, Supplier 1=Digi-Key, Termination=SMD/SMT, Thickness=0.022inch, Voltage Rating=25V, Voltage Rating (DC)=25V, Weight=0.000212oz, Width=0.5mm
C3Z C37 C40 CC CE: library part GRM21BR61E226ME44L, "CAP CER 22UF 25V X5R 0805", Case/Package=0805, Case Code (Metric)=2012, Dielectric=X5R, MANUFACTURER=Murata, Max Operating Temperature=85°C, Min Operating Temperature=-55°C, Package Quantity=3000, Supplier Part Number 1=490-10749-1-ND, Tolerance=20%, Voltage=25V, Capacitance=22uF, Case Code (Imperial)=0805, ComponentLink1Description=http://www.farnell.com/datasheets/2048737.pdf?src-supplier=Farnell, ComponentLink1URL=http://www.farnell.com/datasheets/2048737.pdf?src-supplier=Farnell, ComponentLink2Description=http://www.farnell.com/datasheets/2048737.pdf?src-supplier=Element14, ComponentLink2URL=http://www.farnell.com/datasheets/2048737.pdf?src-supplier=Element14, Composition=Ceramic, Depth=1.25mm, Height=1.25mm, Lead Free="Lead Free", Length=2mm, Manufacturer Part Number=GRM21BR61E226ME44L, Material=Ceramic, Mount="Surface Mount", Packaging="Tape and Reel", Pricing 1="1=0.54, 10=0.383, 100=0.2521, 500=0.18672, 1000=0.15871 (USD)", REACH SVHC="No SVHC", Stock 1=469852, Supplier 1=Digi-Key, Termination=SMD/SMT, Thickness=0.057inch, Voltage Rating=25V, Voltage Rating (DC)=25V, Weight=0.000335oz, Width=1.25mm
C4Z C38: library part TAJB475K035RNJ, "CAP TANT 4.7UF 10% 35V 1411", Capacitance=4.7uF, Case/Package=1210, Case Code (Metric)=3528, Dielectric Material=Tantalum, ESR (Equivalent Series Resistance)=3.1R, Leakage Current=1.6uA, MANUFACTURER="Kyocera AVX", Max Operating Temperature=125°C, Min Operating Temperature=-55°C, Package Quantity=1, Supplier Part Number 1=478-1691-1-ND, Tolerance=20%, Voltage=35V, Case Code (Imperial)=1210, ComponentLink1Description=http://uk.rs-online.com/webdocs/0ccd/0900766b80ccdc61.pdf?src-supplier=RSComponents, ComponentLink1URL=http://uk.rs-online.com/webdocs/0ccd/0900766b80ccdc61.pdf?src-supplier=RSComponents, ComponentLink2Description=http://www.farnell.com/datasheets/1826076.pdf?src-supplier=Element14, ComponentLink2URL=http://www.farnell.com/datasheets/1826076.pdf?src-supplier=Element14, ComponentLink3Description=http://datasheets.avx.com/TAJ.pdf?src-supplier=Digi-Key, ComponentLink3URL=http://datasheets.avx.com/TAJ.pdf?src-supplier=Digi-Key, ComponentLink4Description=http://www.avx.com/docs/Catalogs/taj.pdf?src-supplier=Farnell, ComponentLink4URL=http://www.avx.com/docs/Catalogs/taj.pdf?src-supplier=Farnell, ComponentLink5Description=https://www.alliedelec.com/m/d/9166fb755e7ffffad4c533f86d810ce4.pdf?src-supplier=Allied+Electronics, ComponentLink5URL=https://www.alliedelec.com/m/d/9166fb755e7ffffad4c533f86d810ce4.pdf?src-supplier=Allied+Electronics, ComponentLink6Description=https://www.distrelec.biz/Web/Downloads/_e/ng/taj_ENG.pdf?mime=application%2Fpdf&src-supplier=Distrelec, ComponentLink6URL=https://www.distrelec.biz/Web/Downloads/_e/ng/taj_ENG.pdf?mime=application%2Fpdf&src-supplier=Distrelec, ComponentLink7Description=http://www.avx.com/docs/catalogs/taj.pdf?src-supplier=Avnet+Europe, ComponentLink7URL=http://www.avx.com/docs/catalogs/taj.pdf?src-supplier=Avnet+Europe, ComponentLink8Description=http://www.avx.com/docs/catalogs/taj.pdf?src-supplier=Avnet, ComponentLink8URL=http://www.avx.com/docs/catalogs/taj.pdf?src-supplier=Avnet, ComponentLink9Description=http://www.avxcorp.com/docs/Catalogs/taj.pdf?src-supplier=Future+Electronics, ComponentLink9URL=http://www.avxcorp.com/docs/Catalogs/taj.pdf?src-supplier=Future+Electronics, ComponentLink10Description=http://www.mouser.com/ds/2/40/taj-776811.pdf?src-supplier=Mouser, ComponentLink10URL=http://www.mouser.com/ds/2/40/taj-776811.pdf?src-supplier=Mouser, ComponentLink11Description=https://www.verical.com/server-webapp/html/getDatasheet?partID=149140&src-supplier=Verical, ComponentLink11URL=https://www.verical.com/server-webapp/html/getDatasheet?partID=149140&src-supplier=Verical, Depth=2.8mm, Dissipation Factor=6%, Features="General Purpose", Height=1.9mm, Height - Seated (Max)=0.083inch, Lead Free="Lead Free", Length=3.5mm, Manufacturer Part Number=TAJB475K035RNJ, Mount="Surface Mount,PCB", Number of Pins=2, Packaging="Tape and Reel", Polarity=Polar, Pricing 1="1=0.71, 10=0.505, 100=0.3322, 500=0.2461, 1000=0.20919 (USD)", Radiation Hardening=No, REACH SVHC="No SVHC", Stock 1=3949, Supplier 1=Digi-Key, Termination=SMD/SMT, Voltage Rating=35V, Voltage Rating (DC)=35V, Weight=0.000564oz, Width=2.8mm
C5 C27 CF6 CF7: library part CC0402KRX7R8BB103, "CAP CER 10000PF 25V X7R 0402", Case/Package=0402, Case Code (Metric)=1005, Dielectric=X7R, MANUFACTURER=Yageo, Max Operating Temperature=125°C, Min Operating Temperature=-55°C, Package Quantity=1, Supplier Part Number 1=311-1337-1-ND, Tolerance=10%, Voltage Rating=25V, Capacitance=10nF, Case Code (Imperial)=0402, ComponentLink1Description=http://www.yageo.com/documents/recent/UPY-GPHC_X7R_6.3V-to-50V_18.pdf?src-supplier=Digi-Key, ComponentLink1URL=http://www.yageo.com/documents/recent/UPY-GPHC_X7R_6.3V-to-50V_18.pdf?src-supplier=Digi-Key, ComponentLink2Description=https://www.verical.com/server-webapp/html/getDatasheet?partID=375418&src-supplier=Verical, ComponentLink2URL=https://www.verical.com/server-webapp/html/getDatasheet?partID=375418&src-supplier=Verical, ComponentLink3Description=http://www.yageo.com/documents/recent/UPY-GPHC_X7R_6.3V-to-50V_8.pdf?src-supplier=Avnet, ComponentLink3URL=http://www.yageo.com/documents/recent/UPY-GPHC_X7R_6.3V-to-50V_8.pdf?src-supplier=Avnet, ComponentLink4Description=https://4donline.ihs.com/images/VipMasterIC/IC/YAGO/YAGO-S-A0003557223/YAGO-S-A0003557223-1.pdf?hkey=52A5661711E402568146F3353EA87419&src-supplier=Element14, ComponentLink4URL=https://4donline.ihs.com/images/VipMasterIC/IC/YAGO/YAGO-S-A0003557223/YAGO-S-A0003557223-1.pdf?hkey=52A5661711E402568146F3353EA87419&src-supplier=Element14, ComponentLink5Description=http://www.farnell.com/datasheets/2167236.pdf?src-supplier=Element14, ComponentLink5URL=http://www.farnell.com/datasheets/2167236.pdf?src-supplier=Element14, ComponentLink6Description=http://www.mouser.com/ds/2/447/Yageo_UPY-GP_NP0_16V-to-50V_9-358835.pdf?src-supplier=Mouser, ComponentLink6URL=http://www.mouser.com/ds/2/447/Yageo_UPY-GP_NP0_16V-to-50V_9-358835.pdf?src-supplier=Mouser, Composition=Ceramic, Depth=0.5mm, Halogen Free="Halogen Free", Height=0.5mm, Lead Free="Lead Free", Length=1mm, Manufacturer Part Number=CC0402KRX7R8BB103, Mount="Surface Mount", Packaging="Tape and Reel", Pricing 1="1=0.1, 10=0.021, 100=0.0093, 500=0.00666, 1000=0.00523, 2500=0.00476, 5000=0.00438 (USD)", Radiation Hardening=No, REACH SVHC=Unknown, Stock 1=0, Supplier 1=Digi-Key, Termination=SMD/SMT, Thickness=0.022inch, Voltage Rating (DC)=25V, Width=0.02inch
C16 C17 CX1 CX2: library part GJM0336C1E200JB01D, "CAP CER 20PF 25V C0H 0201", Case/Package=0201, Case Code (Metric)=0603, MANUFACTURER=Murata, Max Operating Temperature=125°C, Min Operating Temperature=-55°C, Supplier Part Number 1=490-13313-1-ND, Tolerance=5%, Voltage Rating=25V, Capacitance=20pF, Case Code (Imperial)=0201, ComponentLink1Description=http://www.mouser.com/ds/2/281/c02e-2905.pdf?src-supplier=Mouser, ComponentLink1URL=http://www.mouser.com/ds/2/281/c02e-2905.pdf?src-supplier=Mouser, ComponentLink2Description=http://search.murata.co.jp/Ceramy/image/img/A01X/partnumbering_e_01.pdf?src-supplier=Digi-Key, ComponentLink2URL=http://search.murata.co.jp/Ceramy/image/img/A01X/partnumbering_e_01.pdf?src-supplier=Digi-Key, Lead Free="Lead Free", Length=0.024inch, Manufacturer Part Number=GJM0336C1E200JB01D, Mount="Surface Mount", Packaging="Tape and Reel", Pricing 1="1=0.1, 10=0.074, 100=0.0329, 500=0.02348, 1000=0.01845, 2500=0.01678, 5000=0.01543 (USD)", Stock 1=13650, Supplier 1=Digi-Key, Termination=SMD/SMT, Thickness=0.013inch, Voltage Rating (DC)=25V, Width=0.012inch
C19 C23: library part 16TQC100MYF, "CAP TANT POLY 100UF 16V 2917", Case/Package=2917, Case Code (Metric)=7343, ESR (Equivalent Series Resistance)=50mR, Leakage Current=160uA, MANUFACTURER=Panasonic, Max Operating Temperature=105°C, Min Operating Temperature=-55°C, Package Quantity=3000, Ripple Current=1.8A, Supplier Part Number 1=P16237CT-ND, Tolerance=20%, Voltage=16V, Capacitance=100uF, Case Code (Imperial)=2917, ComponentLink1Description=http://industrial.panasonic.com/www-data/pdf/AAA8000/AAA8000CE14.pdf?src-supplier=Avnet, ComponentLink1URL=http://industrial.panasonic.com/www-data/pdf/AAA8000/AAA8000CE14.pdf?src-supplier=Avnet, ComponentLink2Description=http://www.farnell.com/datasheets/2059641.pdf?src-supplier=Farnell, ComponentLink2URL=http://www.farnell.com/datasheets/2059641.pdf?src-supplier=Farnell, ComponentLink3Description=http://www.farnell.com/datasheets/1734368.pdf?src-supplier=Element14, ComponentLink3URL=http://www.farnell.com/datasheets/1734368.pdf?src-supplier=Element14, Depth=4.3mm, Dissipation Factor=10%, Features="General Purpose", Height=1.9mm, Height - Seated (Max)=0.079inch, Lead Free="Lead Free", Length=7.3mm, Life (Hours)=2000Hour, Manufacturer Part Number=16TQC100MYF, Material=Polymer, Mount="Surface Mount", Number of Pins=2, Packaging="Tape and Reel", Polarity=Polar, Pricing 1="1=3.55, 10=2.859, 100=2.2299, 500=1.65816, 1000=1.54381 (USD)", Radiation Hardening=No, REACH SVHC="No SVHC", Stock 1=103103, Supplier 1=Digi-Key, Termination=SMD/SMT, Voltage Rating=16V, Voltage Rating (DC)=16V, Width=4.3mm
C21 C25: library part 0402N100J250CT, "10pF ±5% 25V NP0(C0G) 0402 Multilayer Ceramic Capacitors MLCC - SMD/SMT RoHS", MANUFACTURER="Walsin Tech Corp", Package=0402, Manufacturer Part No=0402N100J250CT
C22 C26 C33 C34 C35: library part 0402N330K250CT, "33pF ±10% 25V NP0(C0G) 0402 Multilayer Ceramic Capacitors MLCC - SMD/SMT RoHS", MANUFACTURER="Walsin Tech Corp", Package=0402, Manufacturer Part No=0402N330K250CT
C31: library part CL10A475KA8NQNC, "CAP CER 4.7UF 25V X5R 0603", Capacitance=4.7uF, Case/Package=0603, Case Code (Metric)=1608, Dielectric=X5R, MANUFACTURER=Samsung, Max Operating Temperature=85°C, Min Operating Temperature=-55°C, Package Quantity=1, Supplier Part Number 1=1276-1900-1-ND, Tolerance=10%, Voltage Rating=25V, Case Code (Imperial)=0603, ComponentLink1Description=http://www.samsungsem.com/kr/support/product-search/mlcc/CL10A475KA8NQNC.jsp?src-supplier=Digi-Key, ComponentLink1URL=http://www.samsungsem.com/kr/support/product-search/mlcc/CL10A475KA8NQNC.jsp?src-supplier=Digi-Key, Contact Plating=Tin, Depth=0.8mm, Lead Free="Lead Free", Length=1.6mm, Manufacturer Part Number=CL10A475KA8NQNC, Mount="Surface Mount", Packaging="Tape and Reel", Pricing 1="1=0.37, 10=0.255, 100=0.1528, 500=0.11456, 1000=0.09675 (USD)", Stock 1=2252340, Supplier 1=Digi-Key, Termination=Wraparound, Thickness=0.035inch, Width=0.031inch
CF2: library part EMK107BBJ106MA-T, "CAP CER 10UF 16V X5R 0603", Case/Package=0603, Case Code (Metric)=1608, Dielectric=X5R, MANUFACTURER="Taiyo Yuden", Max Operating Temperature=85°C, Min Operating Temperature=-55°C, Package Quantity=1, Supplier Part Number 1=587-3238-1-ND, Tolerance=20%, Voltage Rating=16V, Capacitance=10uF, Case Code (Imperial)=0603, ComponentLink1Description=https://media.digikey.com/pdf/Data%20Sheets/Taiyo%20Yuden%20PDFs%20URL%20links/EMK107BBJ106MA-T.pdf?src-supplier=Digi-Key, ComponentLink1URL=https://media.digikey.com/pdf/Data%20Sheets/Taiyo%20Yuden%20PDFs%20URL%20links/EMK107BBJ106MA-T.pdf?src-supplier=Digi-Key, ComponentLink2Description=http://www.onlinecomponents.com/productFiles/mf-TAI/3emk107bbj106ma-t.pdf?src-supplier=Onlinecomponents.com, ComponentLink2URL=http://www.onlinecomponents.com/productFiles/mf-TAI/3emk107bbj106ma-t.pdf?src-supplier=Onlinecomponents.com, ComponentLink3Description=http://www.mouser.com/ds/2/396/mlcc11_hq_e-541564.pdf?src-supplier=Mouser, ComponentLink3URL=http://www.mouser.com/ds/2/396/mlcc11_hq_e-541564.pdf?src-supplier=Mouser, Halogen Free="Halogen Free", Height=0.8mm, Length=0.063inch, Manufacturer Part Number=EMK107BBJ106MA-T, Mount="Surface Mount", Packaging="Tape and Reel", Pricing 1="1=0.39, 10=0.269, 100=0.1617, 500=0.12126, 1000=0.10239 (USD)", REACH SVHC=Unknown, Stock 1=495661, Supplier 1=Digi-Key, Termination=SMD/SMT, Thickness=0.031inch, Voltage Rating (DC)=16V, Width=0.031inch
CF3: library part T491X227M016AT, "CAP TANT 220UF 20% 16V 2917", Case/Package=2917, Case Code (Metric)=7343, Dielectric Material=Tantalum, ESR (Equivalent Series Resistance)=500mR, Leakage Current=35.2uA, MANUFACTURER=KEMET, Max Operating Temperature=125°C, Min Operating Temperature=-55°C, Package Quantity=1, Ripple Current=574mA, Supplier Part Number 1=399-10210-1-ND, Tolerance=20%, Voltage Rating=16V, Capacitance=220uF, Case Code (Imperial)=2917, ComponentLink1Description=https://search.kemet.com/component-edge/download/datasheet/T491X227M016AT.pdf?src-supplier=Digi-Key, ComponentLink1URL=https://search.kemet.com/component-edge/download/datasheet/T491X227M016AT.pdf?src-supplier=Digi-Key, ComponentLink2Description=http://www.mouser.com/ds/2/212/KEM_T2005_T491-1093550.pdf?src-supplier=Mouser, ComponentLink2URL=http://www.mouser.com/ds/2/212/KEM_T2005_T491-1093550.pdf?src-supplier=Mouser, Depth=4.3mm, Dissipation Factor=10%, Features="General Purpose", Height=4.3mm, Height - Seated (Max)=0.169inch, Lead Free="Lead Free", Length=7.3mm, Life (Hours)=2000Hour, Manufacturer Part Number=T491X227M016AT, Mount="Surface Mount", Number of Pins=2, Packaging="Tape and Reel", Polarity=Polar, Pricing 1="1=2.53, 10=2.045, 100=1.5613 (USD)", Radiation Hardening=No, REACH SVHC="No SVHC", Stock 1=16347, Supplier 1=Digi-Key, Termination=SMD/SMT, Voltage Rating (DC)=16V, Width=0.169inch
CF17: library part CC0402JRNPO9BN221, "CAP CER 220PF 50V C0G/NPO 0402", Case/Package=0402, Case Code (Metric)=1005, Dielectric=C0G, Dielectric Material=Ceramic, Insulation Resistance=10GR, MANUFACTURER=Yageo, Max Operating Temperature=125°C, Min Operating Temperature=-55°C, Package Quantity=1, Supplier Part Number 1=311-1416-1-ND, Temperature Coefficient=30ppm/°C, Tolerance=10%, Voltage=50V, Capacitance=220pF, Case Code (Imperial)=0402, ComponentLink1Description=http://www.yageo.com/documents/recent/UPY-GP_NP0_16V-to-50V_16.pdf?src-supplier=Digi-Key, ComponentLink1URL=http://www.yageo.com/documents/recent/UPY-GP_NP0_16V-to-50V_16.pdf?src-supplier=Digi-Key, ComponentLink2Description=http://www.yageo.com/documents/recent/UPY-GP_NP0_16V-to-50V_8.pdf?src-supplier=Avnet+Europe, ComponentLink2URL=http://www.yageo.com/documents/recent/UPY-GP_NP0_16V-to-50V_8.pdf?src-supplier=Avnet+Europe, ComponentLink3Description=http://www.farnell.com/datasheets/1132289.pdf?src-supplier=Element14, ComponentLink3URL=http://www.farnell.com/datasheets/1132289.pdf?src-supplier=Element14, ComponentLink4Description=http://www.farnell.com/datasheets/2213336.pdf?src-supplier=Element14, ComponentLink4URL=http://www.farnell.com/datasheets/2213336.pdf?src-supplier=Element14, Depth=0.5mm, Dissipation Factor=0.1%, Height=0.5mm, Lead Free="Lead Free", Length=1mm, Manufacturer Part Number=CC0402JRNPO9BN221, Mount="Surface Mount", Number of Pins=2, Packaging="Tape and Reel", Pricing 1="1=0.1, 10=0.039, 100=0.0172, 500=0.01228, 1000=0.00965, 2500=0.00877, 5000=0.00807 (USD)", Radiation Hardening=No, REACH SVHC="No SVHC", Stock 1=97268, Supplier 1=Digi-Key, Termination=SMD/SMT, Thickness=0.022inch, Voltage Rating=50V, Width=0.02inch
CR1: library part EMK105ABJ225KV-F, "CAP CER 2.2UF 16V X5R 0402", Case/Package=0402, Case Code (Metric)=1005, MANUFACTURER="Taiyo Yuden", Max Operating Temperature=85°C, Min Operating Temperature=-55°C, Supplier Part Number 1=587-6002-1-ND, Tolerance=10%, Voltage Rating=16V, Capacitance=2.2uF, Case Code (Imperial)=0402, ComponentLink1Description=http://ds.yuden.co.jp/TYCOMPAS/ut/detail.do?productNo=EMK105ABJ225KV-F&amp;fileName=EMK105ABJ225KV-F_SS&amp;mode=specSheetDownload&src-supplier=Digi-Key, ComponentLink1URL=http://ds.yuden.co.jp/TYCOMPAS/ut/detail.do?productNo=EMK105ABJ225KV-F&amp;fileName=EMK105ABJ225KV-F_SS&amp;mode=specSheetDownload&src-supplier=Digi-Key, ComponentLink2Description="https://ds.yuden.co.jp/TYCOMPAS/ut/detail?pn=EMK105ABJ225KV-F &amp;u=M&src-supplier=Digi-Key", ComponentLink2URL="https://ds.yuden.co.jp/TYCOMPAS/ut/detail?pn=EMK105ABJ225KV-F &amp;u=M&src-supplier=Digi-Key", Lead Free="Lead Free", Manufacturer Part Number=EMK105ABJ225KV-F, Mount="Surface Mount", Packaging="Tape and Reel", Pricing 1="1=0.2, 10=0.139, 100=0.0706, 500=0.04834, 1000=0.04276, 2500=0.0409, 5000=0.03718 (USD)", Stock 1=755, Supplier 1=Digi-Key
D1 D3 D3Z: "DIODE SCHOTTKY 30V 1A SOD123W", MANUFACTURER=Nexperia, Supplier Part Number 1=1727-5201-1-ND, Manufacturer Part Number=PMEG3010ER,115, Pricing 1="1=0.36, 10=0.29, 100=0.1669, 500=0.1545, 1000=0.10506 (USD)", Stock 1=75070, Supplier 1=Digi-Key
D2: "5.1V 800mW 5uA @ 1V SOD-123FL Zener Diodes RoHS", MANUFACTURER="PANJIT International", Package=SOD-123FL, Manufacturer Part No=BZD27C5V1P_R1_00001
D4: "Bidirectional 3.3V (Max) 3.8V 8V 10A (8/20us) SMD TVS RoHS", MANUFACTURER="Bourne Semicon (Shenzhen)", Package=DFN1006, ComponentLink1Description=https://www.mouser.com/ds/2/302/PESD3V3X1BL-64229.pdf?src-supplier=Mouser, ComponentLink1URL=https://www.mouser.com/ds/2/302/PESD3V3X1BL-64229.pdf?src-supplier=Mouser, ComponentLink2Description=https://assets.nexperia.com/documents/data-sheet/PESD3V3X1BL.pdf?src-supplier=Digi-Key, ComponentLink2URL=https://assets.nexperia.com/documents/data-sheet/PESD3V3X1BL.pdf?src-supplier=Digi-Key, ComponentLink3Description=http://www.onsemi.cn/pub_link/Collateral/ESD9B-D.PDF?src-supplier=Digi-Key, ComponentLink3URL=http://www.onsemi.cn/pub_link/Collateral/ESD9B-D.PDF?src-supplier=Digi-Key, ComponentLink4Description=http://www.onsemi.com/pub/Collateral/ESD9B-D.PDF?src-supplier=Avnet+Europe, ComponentLink4URL=http://www.onsemi.com/pub/Collateral/ESD9B-D.PDF?src-supplier=Avnet+Europe, ComponentLink5Description=http://www.mouser.com/ds/2/308/ESD9B-D-479788.pdf?src-supplier=Mouser, ComponentLink5URL=http://www.mouser.com/ds/2/308/ESD9B-D-479788.pdf?src-supplier=Mouser, ComponentLink6Description=http://www.farnell.com/datasheets/1596367.pdf?src-supplier=Element14, ComponentLink6URL=http://www.farnell.com/datasheets/1596367.pdf?src-supplier=Element14, ComponentLink7Description=https://www.verical.com/server-webapp/html/getDatasheet?partID=292713&src-supplier=Verical, ComponentLink7URL=https://www.verical.com/server-webapp/html/getDatasheet?partID=292713&src-supplier=Verical, ComponentLink8Description=http://www.onsemi.com/pub/Collateral/ESD9B-D.PDF?src-supplier=Avnet, ComponentLink8URL=http://www.onsemi.com/pub/Collateral/ESD9B-D.PDF?src-supplier=Avnet, Manufacturer Part No=ESD9B3.3ST5G-N
DF1: "DIODE SCHOTTKY 40V 3A SMA", Average Rectified Current=3A, Capacitance=250pF, Case/Package=SMA, Forward Voltage=500mV, MANUFACTURER=Diodes, Max Forward Surge Current (Ifsm)=80A, Max Operating Temperature=125°C, Max Repetitive Reverse Voltage (Vrrm)=40V, Min Operating Temperature=-55°C, Package Quantity=5000, Peak Reverse Current=500uA, Supplier Part Number 1=B340A-FDICT-ND, ComponentLink1Description=http://components.arrow.com/part/dataview/41507737S9851045N2867?src-supplier=Arrow, ComponentLink1URL=http://components.arrow.com/part/dataview/41507737S9851045N2867?src-supplier=Arrow, ComponentLink2Description=http://www.farnell.com/datasheets/2238474.pdf?src-supplier=Element14, ComponentLink2URL=http://www.farnell.com/datasheets/2238474.pdf?src-supplier=Element14, ComponentLink3Description=http://www.farnell.com/datasheets/2238474.pdf?src-supplier=Newark, ComponentLink3URL=http://www.farnell.com/datasheets/2238474.pdf?src-supplier=Newark, ComponentLink4Description=https://www.diodes.com/assets/Datasheets/ds30891.pdf?src-supplier=Digi-Key, ComponentLink4URL=https://www.diodes.com/assets/Datasheets/ds30891.pdf?src-supplier=Digi-Key, ComponentLink5Description=https://www.verical.com/server-webapp/html/getDatasheet?partID=143394&src-supplier=Verical, ComponentLink5URL=https://www.verical.com/server-webapp/html/getDatasheet?partID=143394&src-supplier=Verical, Contact Plating=Tin,Matte, Current=3A, Current Rating=3A, Element Configuration=Single, Forward Current=3A, Height=2.3mm, Lead Free="Lead Free", Length=4.6mm, Manufacturer Part Number=B340A-13-F, Max Reverse Voltage (DC)=40V, Mount="Surface Mount", Number of Pins=2, Output Current=3A, Packaging="Tape and Reel", Peak Non-Repetitive Surge Current=80A, Polarity=Standard, Pricing 1="1=0.41, 10=0.332, 25=0.304, 100=0.1909, 250=0.18876, 500=0.17676, 1000=0.12019, 2500=0.11524 (USD)", Radiation Hardening=No, REACH SVHC="No SVHC", Stock 1=369635, Supplier 1=Digi-Key, Termination=SMD/SMT, Voltage=40V, Voltage Rating (DC)=40V, Weight=0.002258oz, Width=2.92mm
J1: "CONN U.FL RCPT STR 50 OHM SMD", Case/Package=SMD/SMT, MANUFACTURER=Hirose, Package Quantity=10000, Supplier Part Number 1=U.FL-R-SMT-1(80)-CUTT, ComponentLink1Description=https://www.hirose.com/product/en/download_file/key_name/U.FL-R-SMT-1%2880%29/category/Specification%20Sheet/doc_file_id/37638/?file_category_id=9&item_id=03310472280&is_series=&src-supplier=Digi-Key, ComponentLink1URL=https://www.hirose.com/product/en/download_file/key_name/U.FL-R-SMT-1%2880%29/category/Specification%20Sheet/doc_file_id/37638/?file_category_id=9&item_id=03310472280&is_series=&src-supplier=Digi-Key, ComponentLink2Description=http://www.mouser.com/ds/2/185/U.FL_catalog-939761.pdf?src-supplier=Mouser, ComponentLink2URL=http://www.mouser.com/ds/2/185/U.FL_catalog-939761.pdf?src-supplier=Mouser, Lead Free="Lead Free", Manufacturer Part Number=U.FL-R-SMT-1(80), Packaging="Tape and Reel", Pricing 1="1=1.07, 500=0.785, 1500=0.74, 2500=0.72, 5000=0.695 (USD)", Stock 1=1272, Supplier 1="Future Electronics"
J2: "DC Power Receptacle Jack 2.5A 2.5mm 6.5mm SMD Power Connectors RoHS", MANUFACTURER="XKB Enterprise", Package=Custom, Manufacturer Part No=DC-005-5A-2.5-SMT
J3: "USB - Micro B Female USB 2 5 SMD USB Connectors RoHS", MANUFACTURER="Jing Extension of the Electronic Co.", ComponentLink1Description=http://www.amphenol-icc.com/media/wysiwyg/files/drawing/10118194.pdf?src-supplier=Digi-Key, ComponentLink1URL=http://www.amphenol-icc.com/media/wysiwyg/files/drawing/10118194.pdf?src-supplier=Digi-Key, ComponentLink2Description=https://cdn.amphenol-icc.com/media/wysiwyg/files/drawing/10118194.pdf?src-supplier=Mouser, ComponentLink2URL=https://cdn.amphenol-icc.com/media/wysiwyg/files/drawing/10118194.pdf?src-supplier=Mouser, ComponentLink3Description=https://cdn.amphenol-icc.com/media/wysiwyg/files/drawing/10118194.pdf?src-supplier=Verical, ComponentLink3URL=https://cdn.amphenol-icc.com/media/wysiwyg/files/drawing/10118194.pdf?src-supplier=Verical, Connector Type=USB,Receptacle, Gender=Receptacle, Link=https://lcsc.com/product-detail/USB-Connectors_Jing-Extension-of-the-Electronic-Co-C10418_C10418.html, Manufacturer Part Number=C10418, Mount="Surface Mount,Horizontal", Number of Contacts=5, Number of Ports=1, Number of Terminals=5, Orientation="Right Angle", Termination=Solder
J4: "CONN HEADER SMD 10POS 1.27MM"